# Altium PCB PCB1.PcbDoc (part 1 of 5)
Units mm, origin at the board's own origin, x right, y up, seen from the top; angles counter-clockwise.
Board outline 50 x 70 mm, 6 copper layers (Top Layer, L2, L3, L4, L5, Bottom Layer), stack 1.232 mm thick; 119 components, 75 nets, 612 pads, 243 vias.
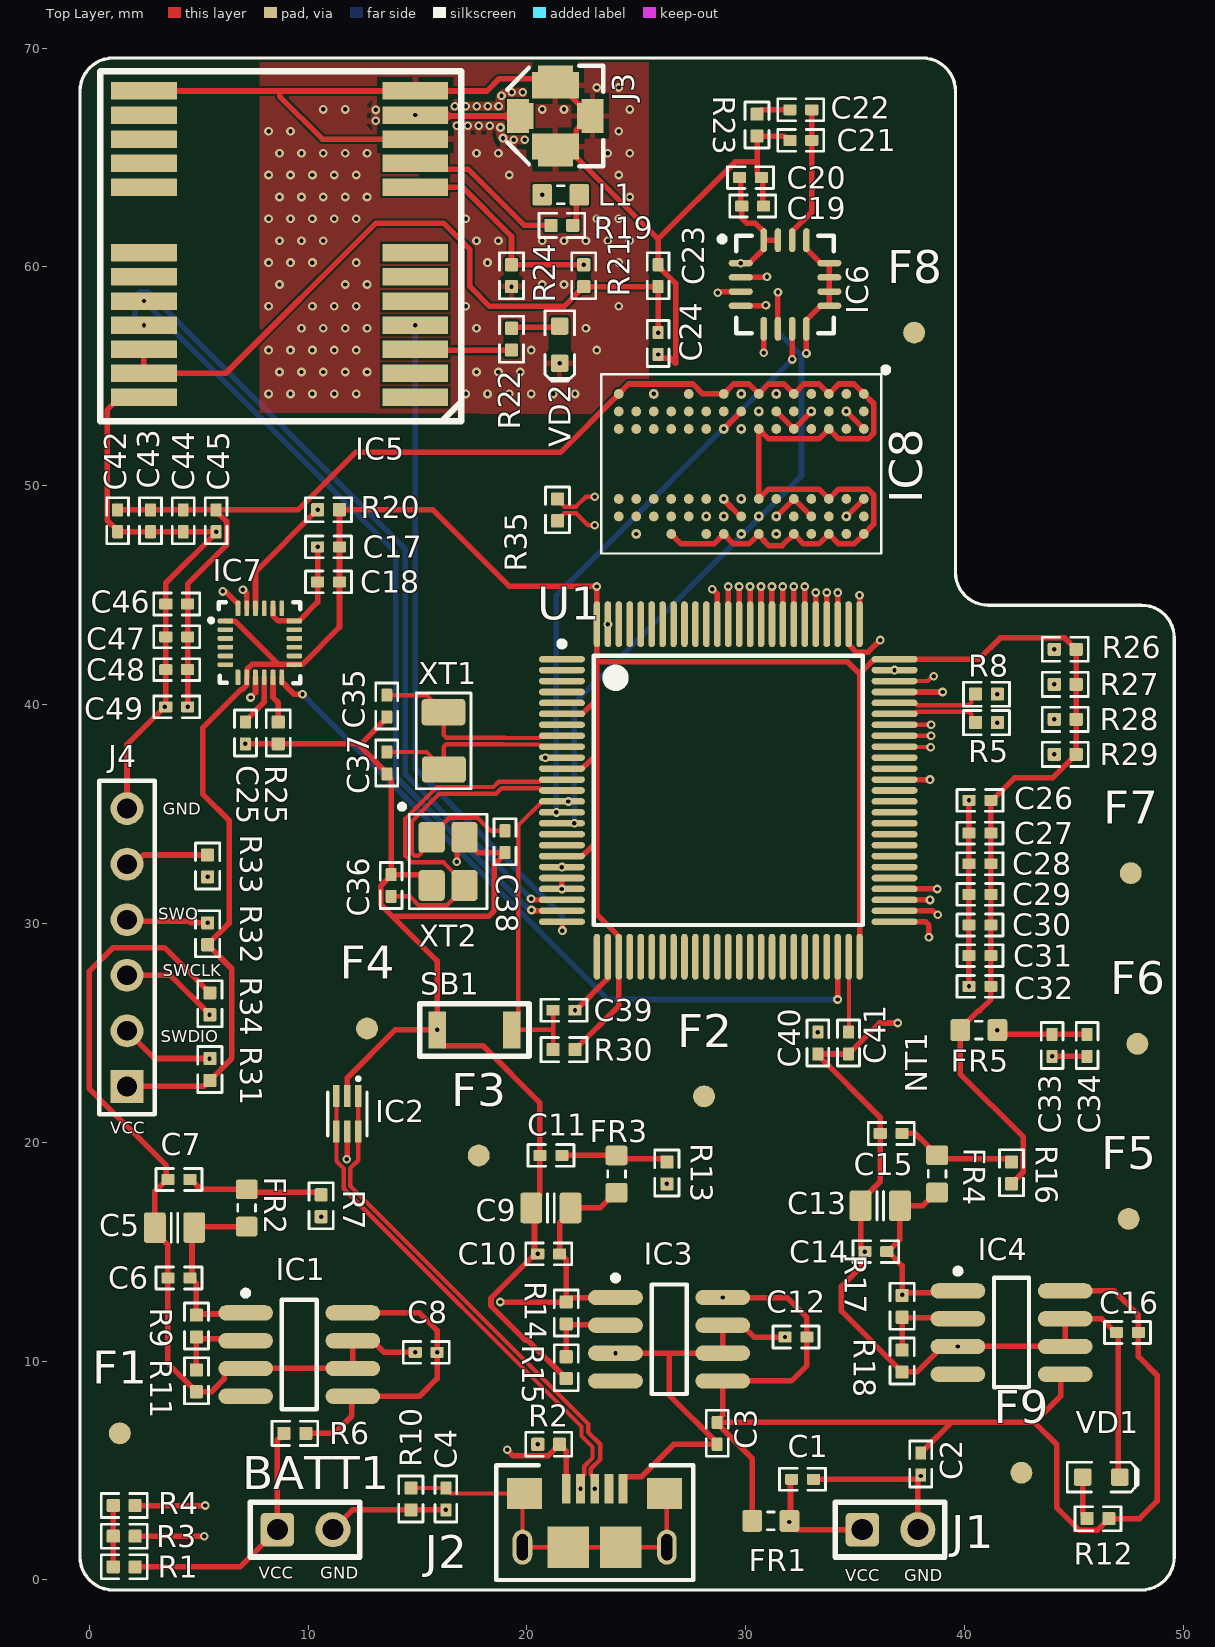
[diagram p0: Top Layer view]
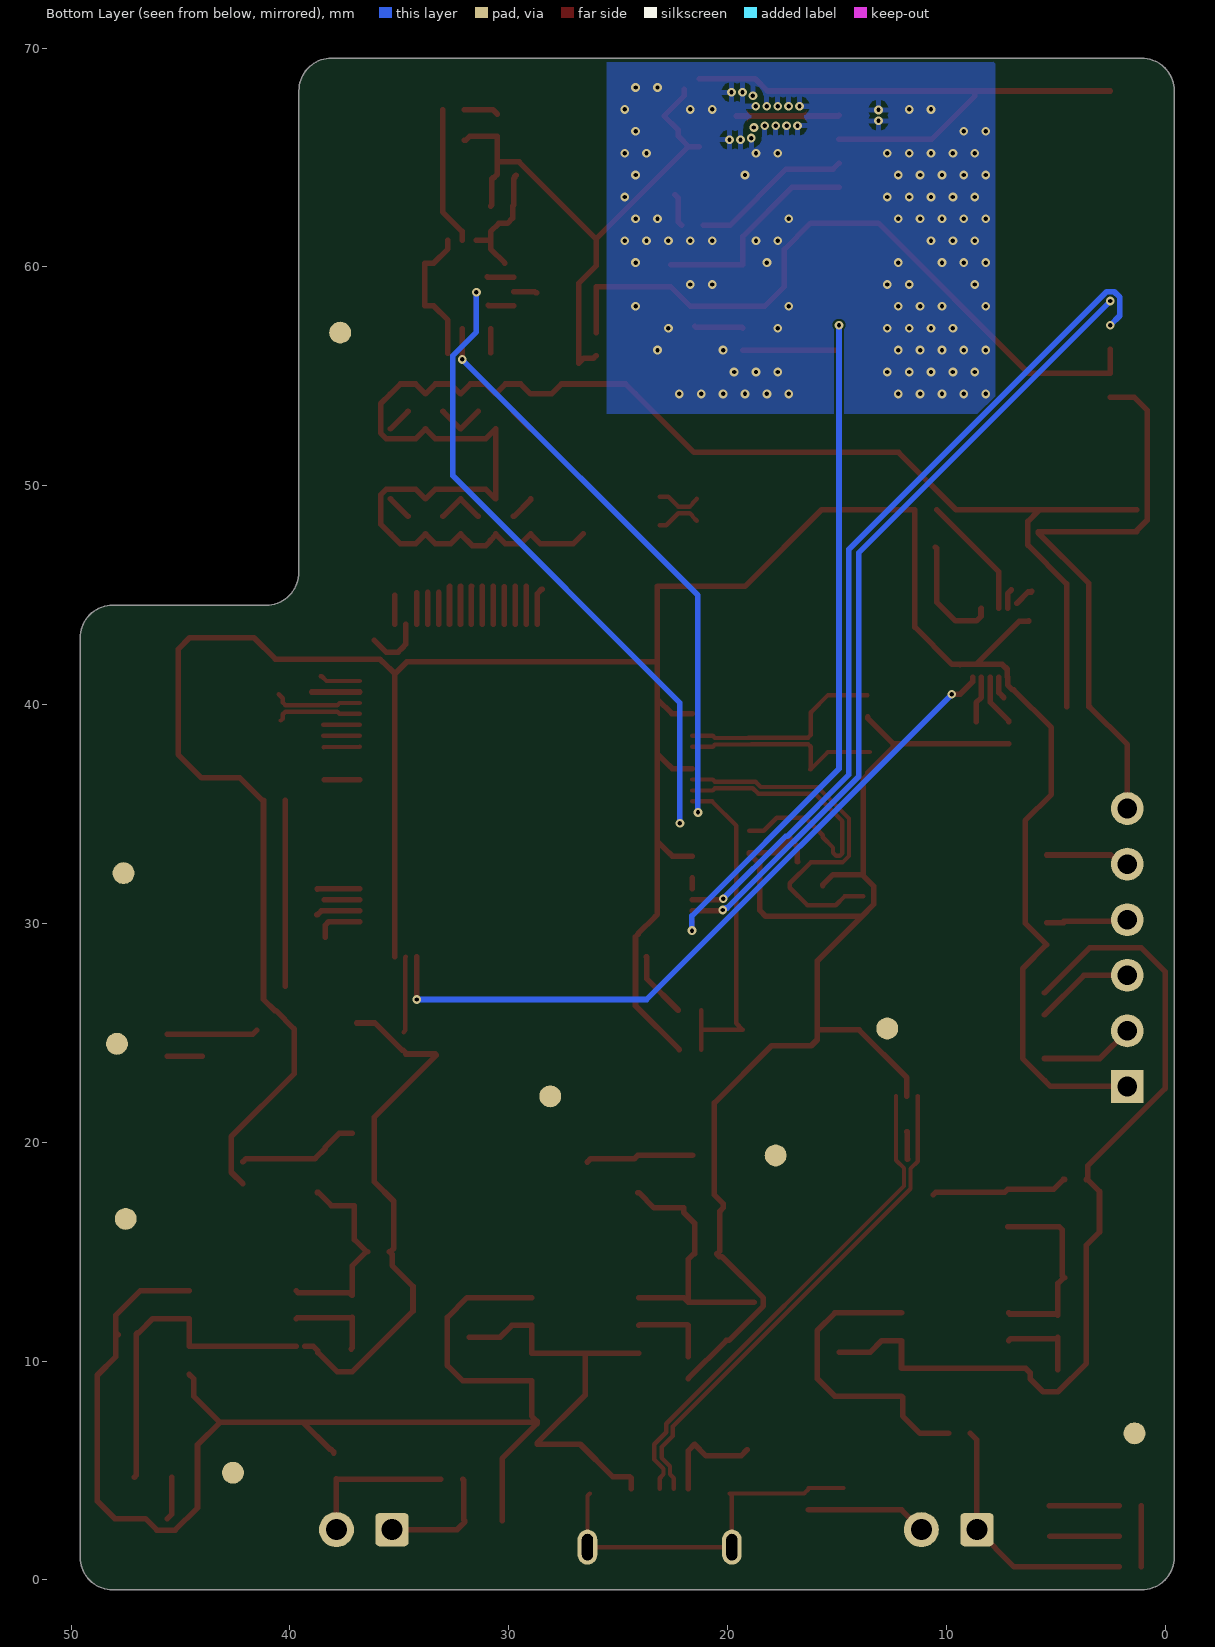
[diagram p1: Bottom Layer view, seen from below]
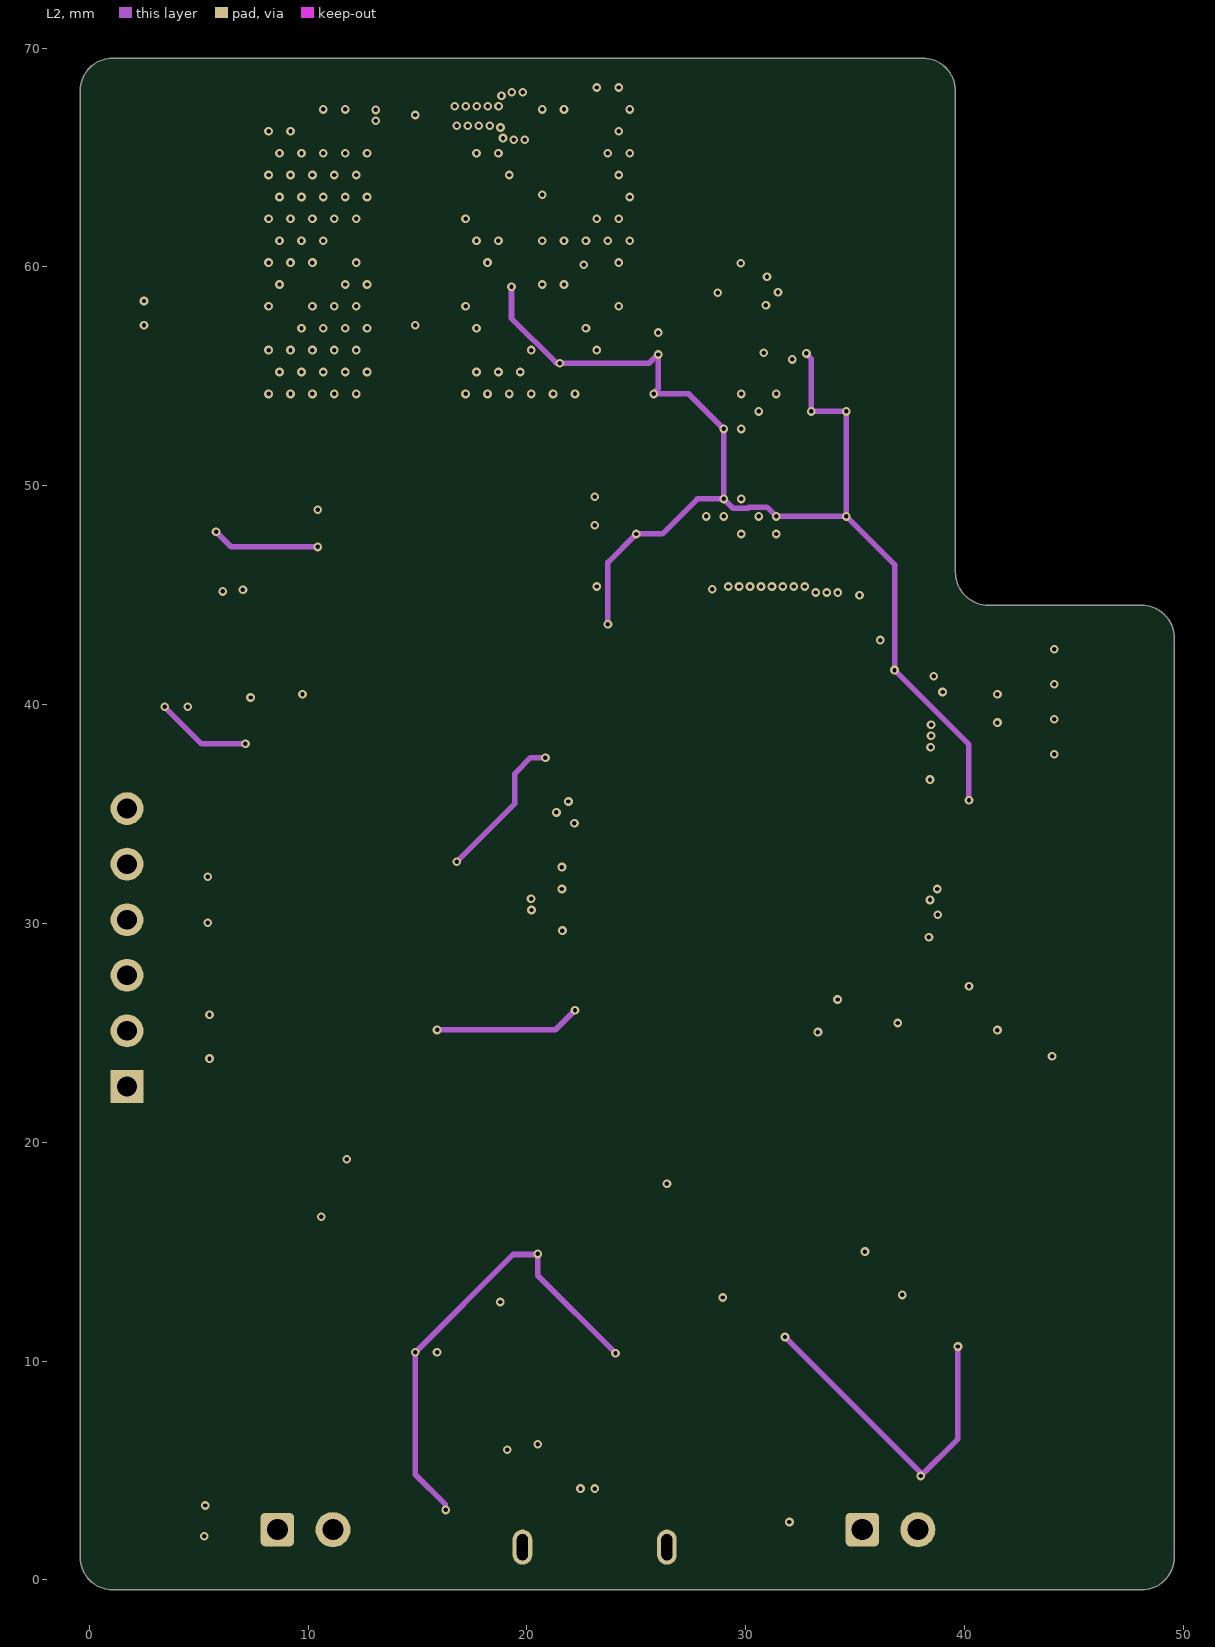
[diagram p2: L2]
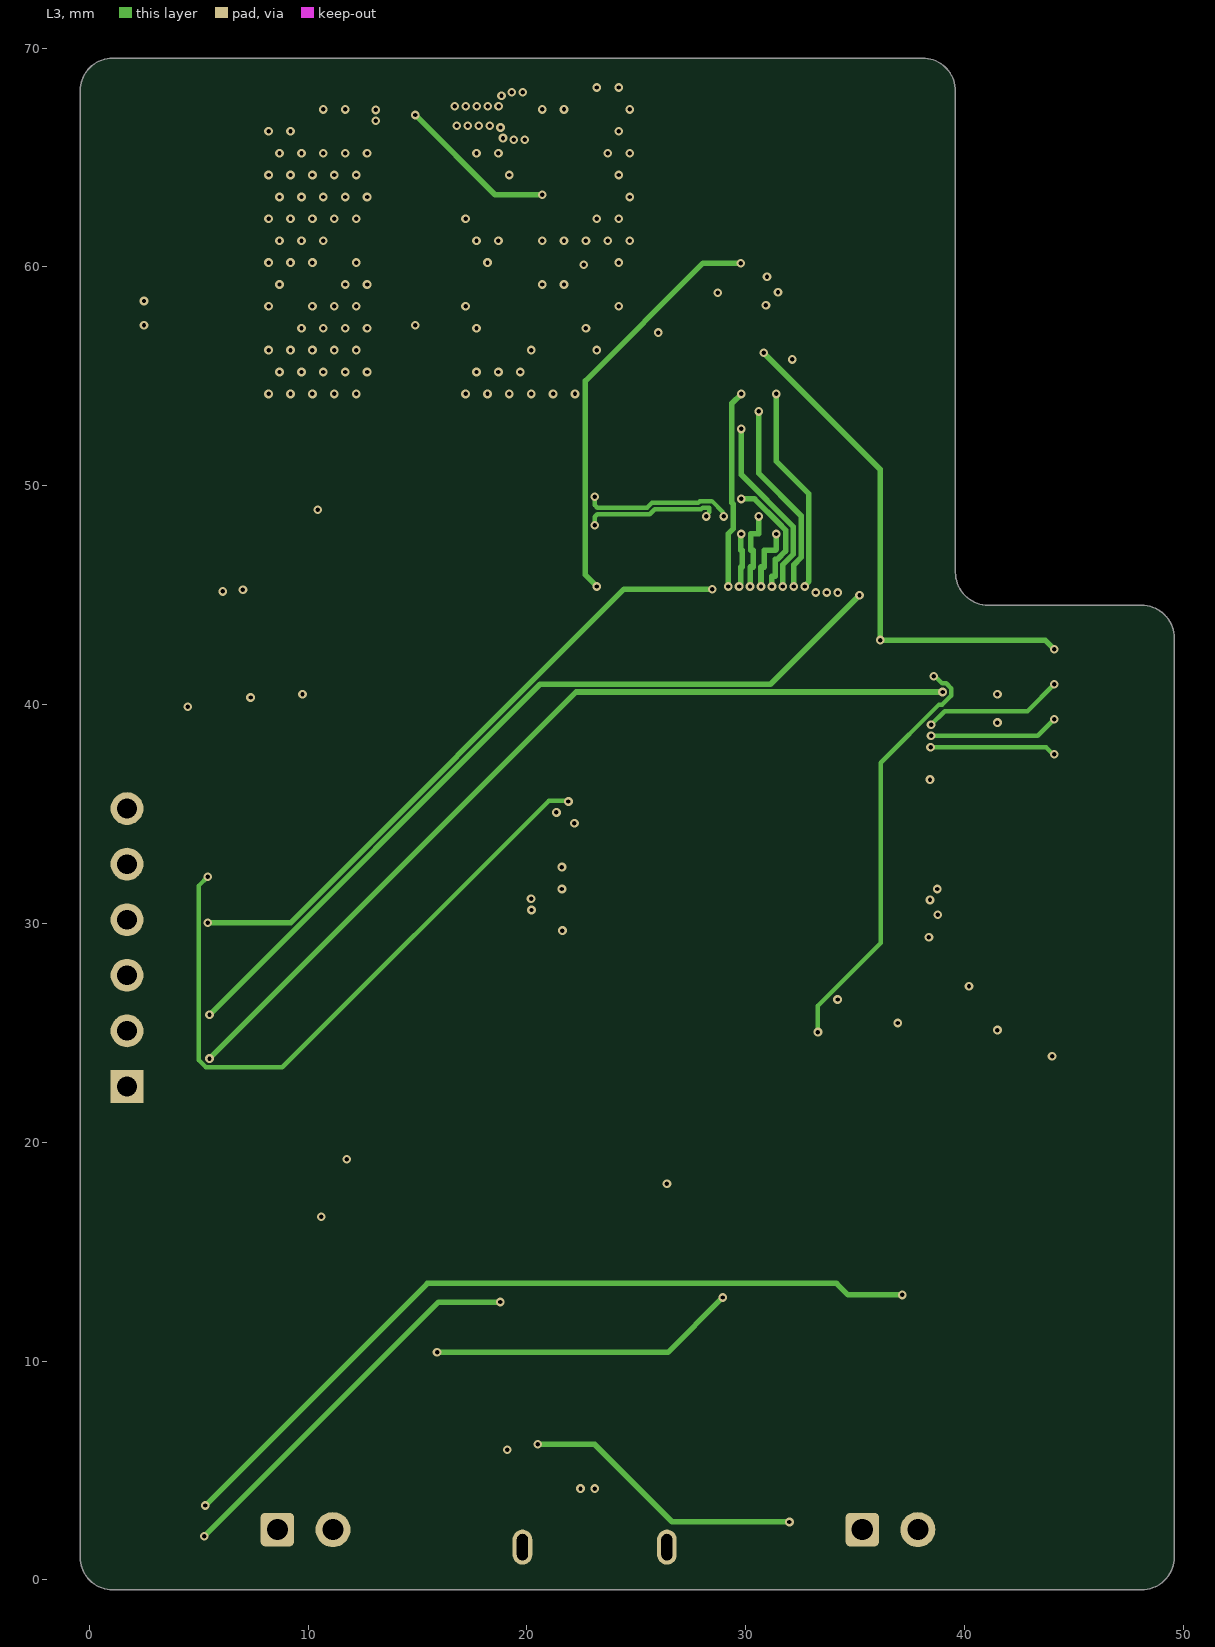
[diagram p3: L3]
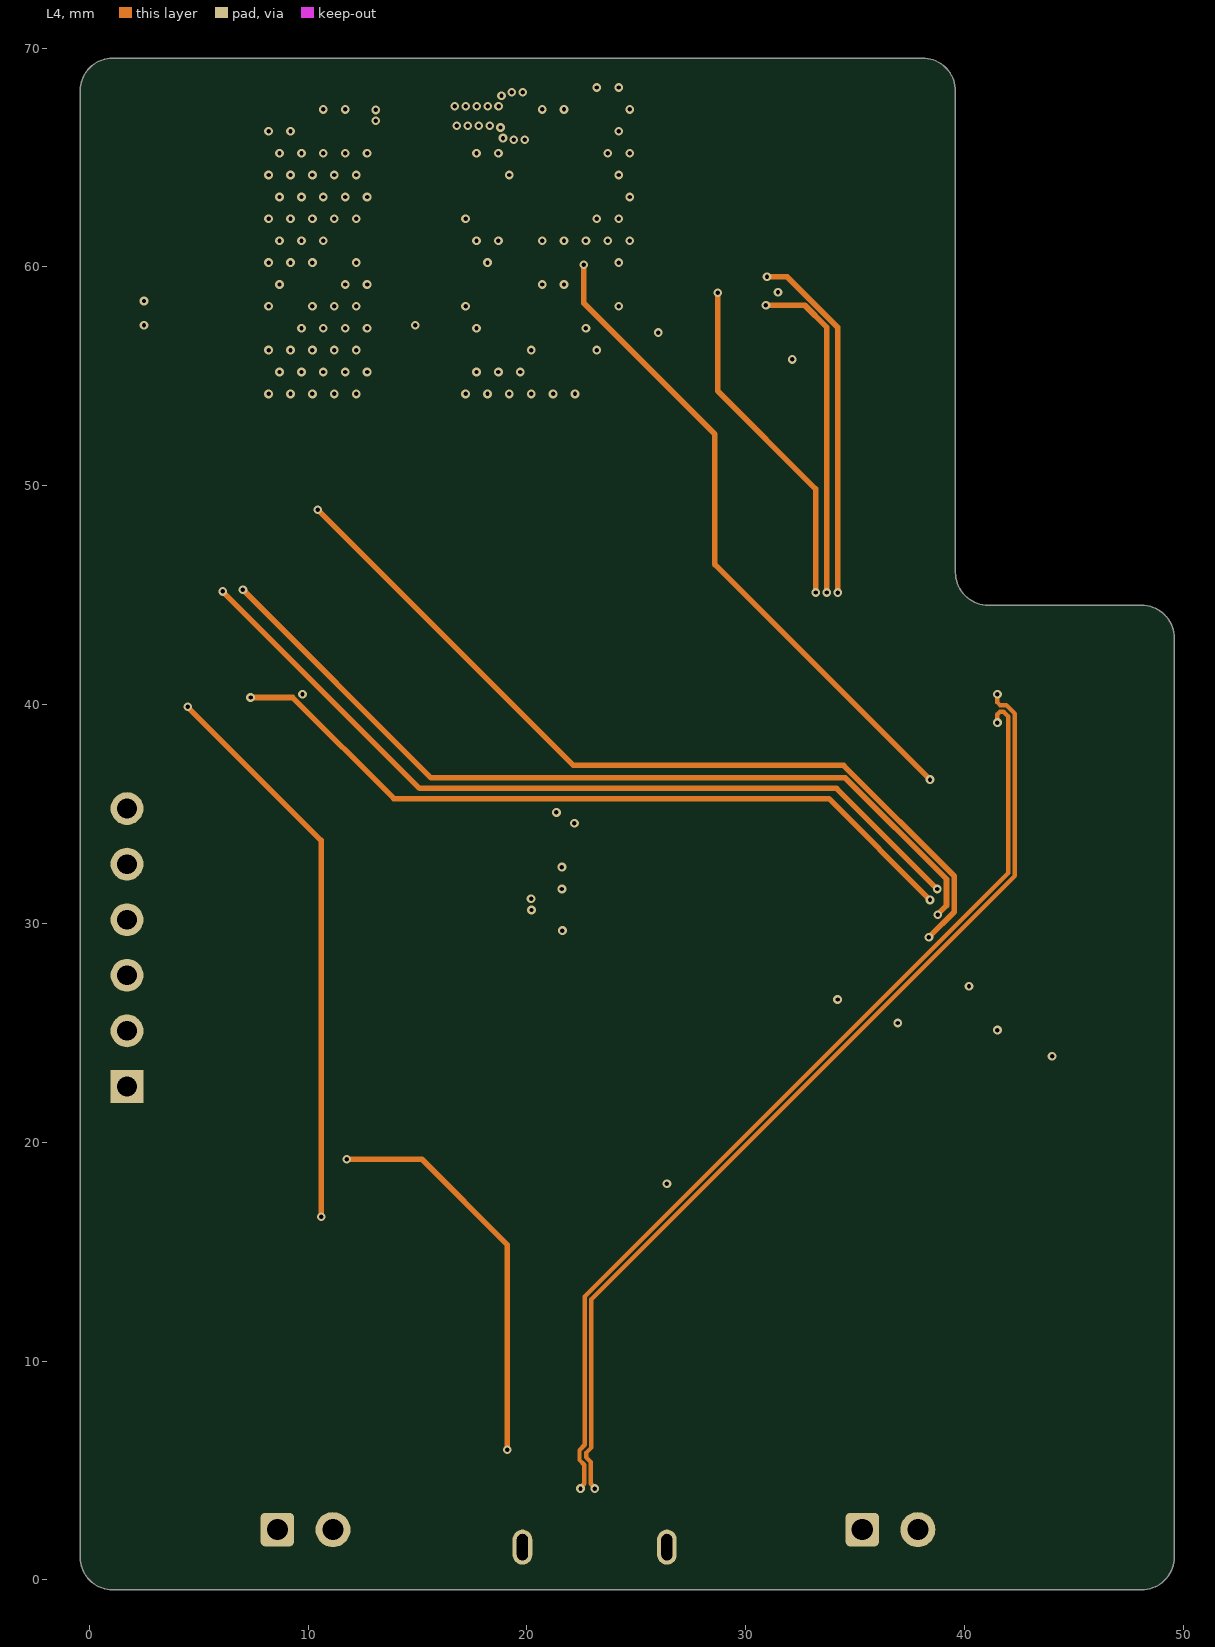
[diagram p4: L4]
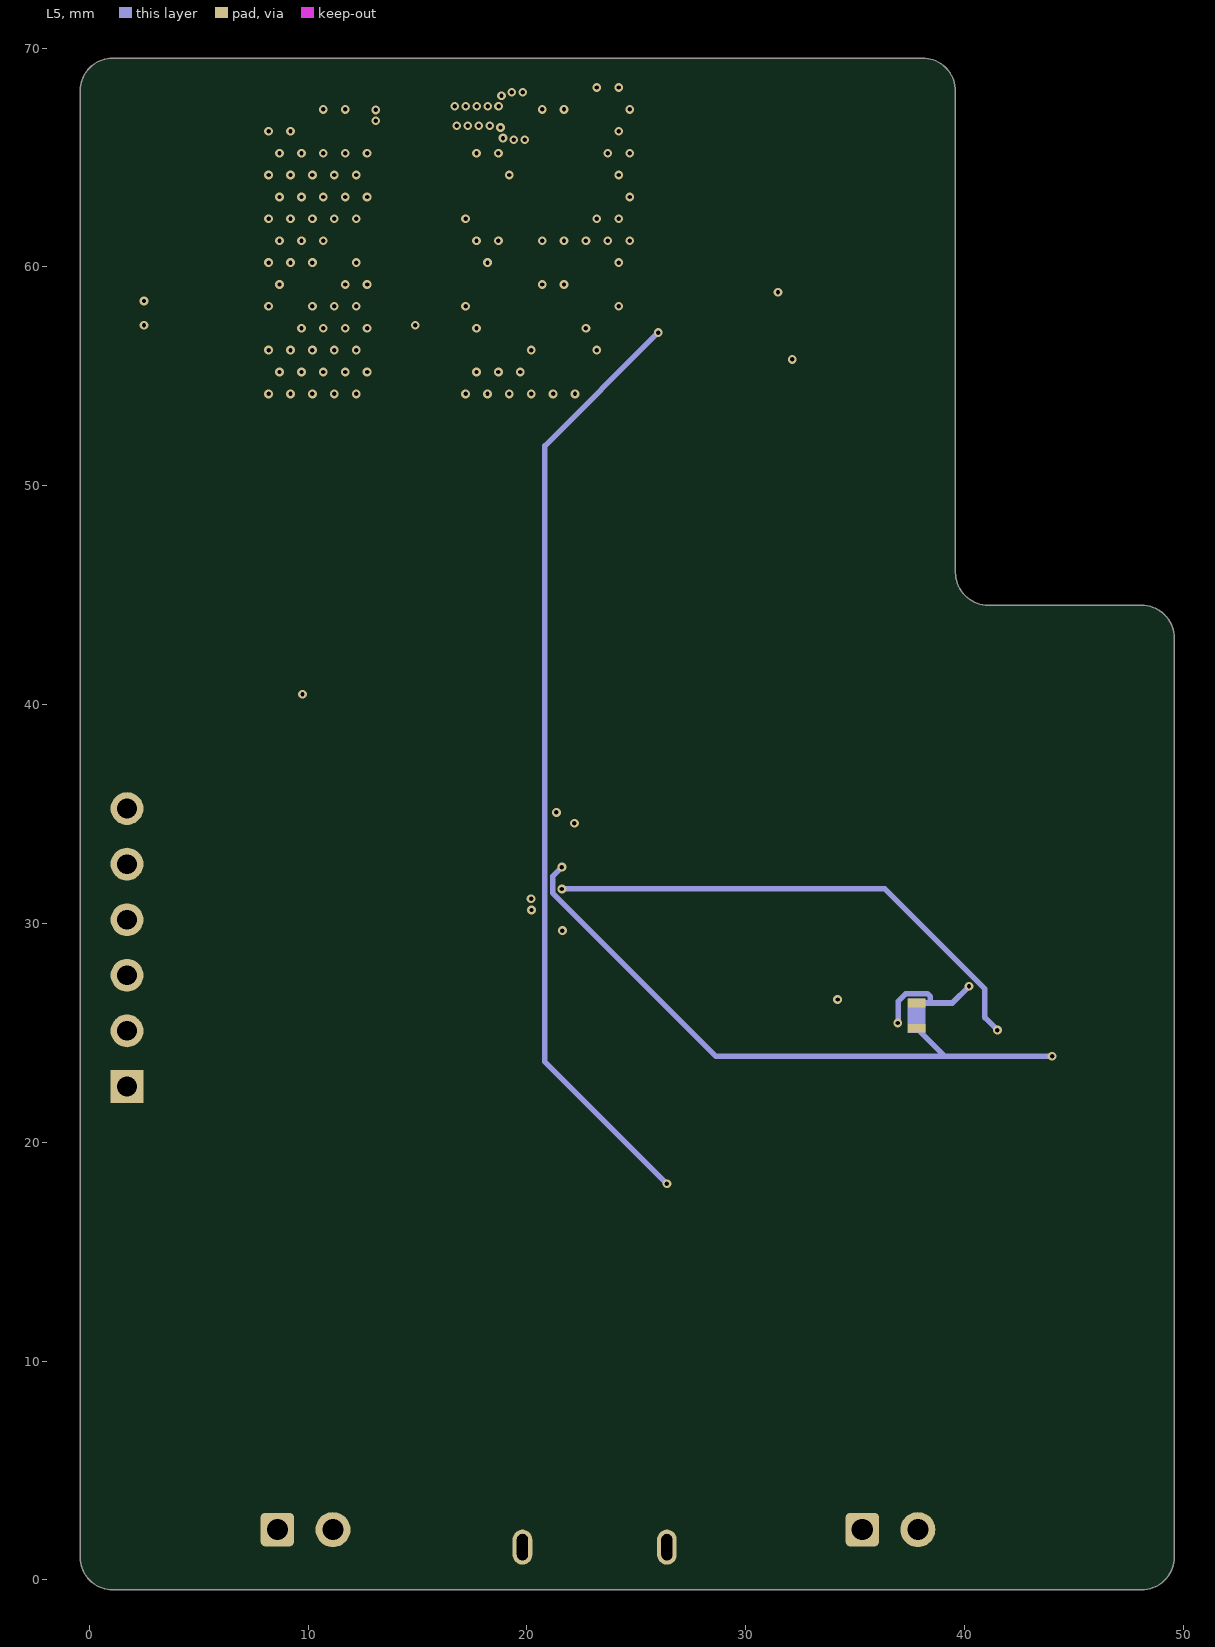
[diagram p5: L5]

## Layer stack, top to bottom
Top Solder: solder mask 0.01, Solder Resist, Dk 3.5
Top Layer: signal copper 0.036
Dielectric 1: core 0.254, FR-4, Dk 4.2
L2: signal copper 0.036
Dielectric 3: prepreg 0.127, PP-006, Dk 4.2
L3: signal copper 0.036
Dielectric 4: core 0.254, FR-4, Dk 4.2
L4: signal copper 0.036
Dielectric 6: prepreg 0.127, PP-006, Dk 4.2
L5: signal copper 0.036
Dielectric 5: core 0.254, FR-4, Dk 4.2
Bottom Layer: signal copper 0.036
Bottom Solder: solder mask 0.01, Solder Resist, Dk 3.5

## Board outline
-0.415,1.045 -0.415,68.045 cw(c1.085,68.045) 1.085,69.545 38.085,69.545 cw(c38.085,68.045) 39.585,68.045 39.585,46.045 ccw(c41.085,46.045) 41.085,44.545 48.085,44.545 cw(c48.085,43.045) 49.585,43.045 49.585,1.045 cw(c48.085,1.045) 48.085,-0.455 1.085,-0.455 cw(c1.085,1.045)

## Design rules (kind name [scope] priority, off if disabled: settings)
Clearance "Stitching No Net" [IsStitchingVia and InNet('No Net') vs (IsVia and (Not IsStitchingVia)) Or IsPad] p1: gap=0.127 ignorepadtopadclearanceinfootprint=FALSE
Clearance [All] p2: gap=0.1 ignorepadtopadclearanceinfootprint=FALSE
DiffPairsRouting DiffPairsRouting_1 [InDifferentialPair('CPU_LSOSC')] p1: maxlimit=0.262 minlimit=0.1 mostfreqgap=0.1 toplayer_minwidth=0.2 toplayer_maxwidth=0.2 toplayer_prefwidth=0.2 midlayer1_minwidth=0.2 midlayer1_maxwidth=0.2 midlayer1_prefwidth=0.2 midlayer2_minwidth=0.2 midlayer2_maxwidth=0.2 midlayer2_prefwidth=0.2 midlayer3_minwidth=0.2 midlayer3_maxwidth=0.2 midlayer3_prefwidth=0.2 midlayer4_minwidth=0.2 midlayer4_maxwidth=0.2 midlayer4_prefwidth=0.2 bottomlayer_minwidth=0.2 bottomlayer_maxwidth=0.2 bottomlayer_prefwidth=0.2 maxuncoupledlength=12.7
DiffPairsRouting DiffPairsRouting_7 [InDifferentialPair('DDR2_1_CLK')] p2: maxlimit=0.262 minlimit=0.1 mostfreqgap=0.1 toplayer_minwidth=0.2 toplayer_maxwidth=0.2 toplayer_prefwidth=0.2 midlayer1_minwidth=0.2 midlayer1_maxwidth=0.2 midlayer1_prefwidth=0.2 midlayer2_minwidth=0.2 midlayer2_maxwidth=0.2 midlayer2_prefwidth=0.2 midlayer3_minwidth=0.2 midlayer3_maxwidth=0.2 midlayer3_prefwidth=0.2 midlayer4_minwidth=0.2 midlayer4_maxwidth=0.2 midlayer4_prefwidth=0.2 bottomlayer_minwidth=0.2 bottomlayer_maxwidth=0.2 bottomlayer_prefwidth=0.2 maxuncoupledlength=12.7
DiffPairsRouting DiffPairsRouting_6 [InDifferentialPair('USB2_D1')] p3: maxlimit=0.6 minlimit=0.1 mostfreqgap=0.1 toplayer_minwidth=0.2 toplayer_maxwidth=0.2 toplayer_prefwidth=0.2 midlayer1_minwidth=0.2 midlayer1_maxwidth=0.2 midlayer1_prefwidth=0.2 midlayer2_minwidth=0.2 midlayer2_maxwidth=0.2 midlayer2_prefwidth=0.2 midlayer3_minwidth=0.2 midlayer3_maxwidth=0.2 midlayer3_prefwidth=0.2 midlayer4_minwidth=0.2 midlayer4_maxwidth=0.2 midlayer4_prefwidth=0.2 bottomlayer_minwidth=0.2 bottomlayer_maxwidth=0.2 bottomlayer_prefwidth=0.2 maxuncoupledlength=12.7
DiffPairsRouting DiffPairsRouting_5 [InDifferentialPair('USB2_D2')] p4: maxlimit=0.262 minlimit=0.1 mostfreqgap=0.1 toplayer_minwidth=0.2 toplayer_maxwidth=0.2 toplayer_prefwidth=0.2 midlayer1_minwidth=0.2 midlayer1_maxwidth=0.2 midlayer1_prefwidth=0.2 midlayer2_minwidth=0.2 midlayer2_maxwidth=0.2 midlayer2_prefwidth=0.2 midlayer3_minwidth=0.2 midlayer3_maxwidth=0.2 midlayer3_prefwidth=0.2 midlayer4_minwidth=0.2 midlayer4_maxwidth=0.2 midlayer4_prefwidth=0.2 bottomlayer_minwidth=0.2 bottomlayer_maxwidth=0.2 bottomlayer_prefwidth=0.2 maxuncoupledlength=12.7
DiffPairsRouting DiffPairsRouting_4 [InDifferentialPair('DDR2_1_CLK')] p5: maxlimit=0.262 minlimit=0.1 mostfreqgap=0.1 toplayer_minwidth=0.2 toplayer_maxwidth=0.2 toplayer_prefwidth=0.2 midlayer1_minwidth=0.2 midlayer1_maxwidth=0.2 midlayer1_prefwidth=0.2 midlayer2_minwidth=0.2 midlayer2_maxwidth=0.2 midlayer2_prefwidth=0.2 midlayer3_minwidth=0.2 midlayer3_maxwidth=0.2 midlayer3_prefwidth=0.2 midlayer4_minwidth=0.2 midlayer4_maxwidth=0.2 midlayer4_prefwidth=0.2 bottomlayer_minwidth=0.2 bottomlayer_maxwidth=0.2 bottomlayer_prefwidth=0.2 maxuncoupledlength=12.7
DiffPairsRouting DiffPairsRouting_3 [InDifferentialPair('CPU_HSOSC')] p6: maxlimit=0.262 minlimit=0.1 mostfreqgap=0.1 toplayer_minwidth=0.2 toplayer_maxwidth=0.2 toplayer_prefwidth=0.2 midlayer1_minwidth=0.2 midlayer1_maxwidth=0.2 midlayer1_prefwidth=0.2 midlayer2_minwidth=0.2 midlayer2_maxwidth=0.2 midlayer2_prefwidth=0.2 midlayer3_minwidth=0.2 midlayer3_maxwidth=0.2 midlayer3_prefwidth=0.2 midlayer4_minwidth=0.2 midlayer4_maxwidth=0.2 midlayer4_prefwidth=0.2 bottomlayer_minwidth=0.2 bottomlayer_maxwidth=0.2 bottomlayer_prefwidth=0.2 maxuncoupledlength=12.7
DiffPairsRouting DiffPairsRouting_2 [InDifferentialPair('USB2_D2')] p7: maxlimit=0.262 minlimit=0.1 mostfreqgap=0.1 toplayer_minwidth=0.2 toplayer_maxwidth=0.2 toplayer_prefwidth=0.2 midlayer1_minwidth=0.2 midlayer1_maxwidth=0.2 midlayer1_prefwidth=0.2 midlayer2_minwidth=0.2 midlayer2_maxwidth=0.2 midlayer2_prefwidth=0.2 midlayer3_minwidth=0.2 midlayer3_maxwidth=0.2 midlayer3_prefwidth=0.2 midlayer4_minwidth=0.2 midlayer4_maxwidth=0.2 midlayer4_prefwidth=0.2 bottomlayer_minwidth=0.2 bottomlayer_maxwidth=0.2 bottomlayer_prefwidth=0.2 maxuncoupledlength=12.7
DiffPairsRouting [All] p8: maxlimit=0.254 minlimit=0.254 mostfreqgap=0.254 toplayer_minwidth=0.381 toplayer_maxwidth=0.381 toplayer_prefwidth=0.381 midlayer1_minwidth=0.381 midlayer1_maxwidth=0.381 midlayer1_prefwidth=0.381 midlayer2_minwidth=0.381 midlayer2_maxwidth=0.381 midlayer2_prefwidth=0.381 midlayer3_minwidth=0.381 midlayer3_maxwidth=0.381 midlayer3_prefwidth=0.381 midlayer4_minwidth=0.381 midlayer4_maxwidth=0.381 midlayer4_prefwidth=0.381 bottomlayer_minwidth=0.381 bottomlayer_maxwidth=0.381 bottomlayer_prefwidth=0.381 maxuncoupledlength=12.7
HoleToHoleClearance [All] p1: gap=0.2 allowstackedmicrovias=TRUE
MatchedLengths [InNetClass('DDR2_2_DQ[0..7]')] p1: tolerance=7 checknetsindiffpair=FALSE checkdiffpairvsdiffpair=TRUE checkxsignals=TRUE checkothers=TRUE
MinimumSolderMaskSliver [All] p1: minsoldermaskwidth=0.1
PolygonConnect [All] p1: connectstyle=Relief reliefconductorwidth=0.254 reliefentries=4 polygonreliefangle="90 Angle" airgapwidth=0.254
RoutingVias [All] p1: holewidth=0.2 width=0.4 viastyle="Through Hole" minholewidth=0.2 minwidth=0.4 maxholewidth=0.711 maxwidth=1.27
SolderMaskExpansion [All] p1: expansion=0.1 istentingtop=FALSE
SupplyNets "Schematic Supply Nets_7" [InNet('VCC3P7_BATT')] p1: voltage=0.000
SupplyNets "Schematic Supply Nets_6" [InNet('VCC5P0_USB')] p2: voltage=0.000
SupplyNets "Schematic Supply Nets_5" [InNet('AVDD')] p3: voltage=0.000
SupplyNets "Schematic Supply Nets_4" [InNet('GND')] p4: voltage=0.000
SupplyNets "Schematic Supply Nets_3" [InNet('VCC3P3_MCU')] p5: voltage=0.000
SupplyNets "Schematic Supply Nets_2" [InNet('VCC3P3_RF')] p6: voltage=0.000
SupplyNets "Schematic Supply Nets_1" [InNet('GNDA')] p7: voltage=0.000
SupplyNets "Schematic Supply Nets" [InNet('VCC1P8_DDR2')] p8: voltage=0.000
Width [All] p1: maxlimit=0.254 minlimit=0.1 preferedwidth=0.254
27 further rules are at their usual default settings.

## Classes and differential pairs
net class DDR2_2_DQ[0..7]: DDR2_2_DQ0 DDR2_2_DQ1 DDR2_2_DQ2 DDR2_2_DQ3 DDR2_2_DQ4 DDR2_2_DQ5 DDR2_2_DQ6 DDR2_2_DQ7
component class 02_MCU_DDR: C26 C27 C28 C29 C30 C31 C32 C33 C34 C35 C36 C37 C38 C39 C40 C41 C42 C43 C44 C45 C46 C47 C48 C49 F9 FR5 IC8 J4 NT1 R26 R27 R28 R29 R30 R31 R32 R33 R34 R35 SB1 XT1 XT2
component class 01_Power_RF: ANT1 BATT1 C1 C2 C3 C4 C5 C6 C7 C8 C9 C10 C11 C12 C13 C14 C15 C16 C17 C18 C19 C20 C21 C22 C23 C24 C25 F1 F2 F3 F4 F5 F6 F7 F8 FR1 FR2 FR3 FR4 IC1 IC2 IC3 IC4 IC6 IC7 J1 J2 J3 L1 R1 R2 R3 R4 R5 R6 R7 R8 R9 R10 R11 R12 R13 R14 R15 R16 R17 R18 R19 R20 R21 R22 R23 R24 R25 VD1 VD2
differential pair USB2_D2: +USB2_D2_P -USB2_D2_N
differential pair USB2_D1: +USB2_D1_P -USB2_D1_N
differential pair DDR2_1_CLK: +DDR2_1_CLK_P -DDR2_1_CLK_N
differential pair CPU_LSOSC: +CPU_LSOSC_P -CPU_LSOSC_N
differential pair CPU_HSOSC: +CPU_HSOSC_P -CPU_HSOSC_N

## Components (designator, comment, footprint, x,y, rotation, side; value= is the part's Value field where it differs from the comment)
BATT1 "3.7V, 600mAh" HDR_1x2 9.87,2.3 r90 top
C1 "100nF, 16V" CAP0402 32.6,4.6 r180 top
C2 "10uF, 6.3V" CAP0402 38,5.3 r90 top
C3 "4.7uF, 6.3V" CAP0402 28.7,6.7 r90 top
C4 "3.9nF, 16V" CAP0402 16.3,3.7 r90 top
C5 "47uF, 6.3V" CAP0805 3.9,16.1 r0 top
C6 "10uF, 6.3V" CAP0402 4.1,13.8 r0 top
C7 "100nF, 16V" CAP0402 4.1,18.3 r180 top
C8 "10uF, 6.3V" CAP0402 15.4,10.4 r0 top
C9 "47uF, 6.3V" CAP0805 21.1,17 r0 top
C10 "10uF, 6.3V" CAP0402 21,14.9 r0 top
C11 "100nF, 16V" CAP0402 21.1,19.4 r0 top
C12 "10uF, 6.3V" CAP0402 32.3,11.1 r0 top
C13 "47uF, 6.3V" CAP0805 36.15,17.105 r0 top
C14 "10uF, 6.3V" CAP0402 35.95,15.005 r0 top
C15 "100nF, 16V" CAP0402 36.65,20.405 r0 top
C16 "10uF, 6.3V" CAP0402 47.45,11.305 r0 top
C17 "100nF, 16V" CAP0402 10.94,47.208 r0 top
C18 "100nF, 16V" CAP0402 10.94,45.608 r0 top
C19 "4.7uF, 6.3V" CAP0402 30.321,62.783 r180 top
C20 "100nF, 16V" CAP0402 30.221,64.083 r180 top
C21 "10nF, 50V" CAP0402 32.521,65.783 r0 top
C22 "470nF, 10V" CAP0402 32.521,67.183 r0 top
C23 "100nF, 16V" CAP0402 26,59.6 r270 top
C24 "10uF, 6.3V" CAP0402 26,56.5 r90 top
C25 "100nF, 16V" CAP0402 7.14,38.708 r90 top
C26 "100nF, 16V" CAP0402 40.704,35.628 r0 top
C27 "100nF, 16V" CAP0402 40.704,34.128 r0 top
C28 "100nF, 16V" CAP0402 40.704,32.728 r0 top
C29 "100nF, 16V" CAP0402 40.704,31.328 r0 top
C30 "100nF, 16V" CAP0402 40.704,29.928 r0 top
C31 "100nF, 16V" CAP0402 40.704,28.528 r0 top
C32 "100nF, 16V" CAP0402 40.704,27.128 r0 top
C33 "10uF, 6.3V" CAP0402 44.004,24.428 r90 top
C34 "100nF, 16V" CAP0402 45.604,24.428 r90 top
C35 "4pF, 50V" CAP0402 13.6,39.935 r90 top
C36 "33pF, 50V" CAP0402 13.8,31.735 r90 top
C37 "4pF, 50V" CAP0402 13.6,37.335 r90 top
C38 "33pF, 50V" CAP0402 19,33.735 r270 top
C39 "100nF, 16V" CAP0402 21.7,26.035 r180 top
C40 "2.2uF, 4V" CAP0402 33.3,24.535 r90 top
C41 "2.2uF, 4V" CAP0402 34.7,24.535 r90 top
C42 "100nF, 16V" CAP0402 1.3,48.4 r90 top
C43 "100nF, 16V" CAP0402 2.8,48.4 r90 top
C44 "100nF, 16V" CAP0402 4.3,48.4 r90 top
C45 "100nF, 16V" CAP0402 5.8,48.4 r90 top
C46 "10uF, 6.3V" CAP0402 4,44.6 r0 top
C47 "4.7uF, 6.3V" CAP0402 4,43.1 r0 top
C48 "2.2uF, 4V" CAP0402 4,41.6 r0 top
C49 "100nF, 16V" CAP0402 4,39.9 r0 top
F1 "Fiducial" Fiducial 1.4,6.7 r0 top
F2 "Fiducial" Fiducial 28.1,22.1 r0 top
F3 "Fiducial" Fiducial 17.8,19.4 r0 top
F4 "Fiducial" Fiducial 12.7,25.2 r0 top
F5 "Fiducial" Fiducial 47.5,16.5 r0 top
F6 "Fiducial" Fiducial 47.9,24.5 r0 top
F7 "Fiducial" Fiducial 47.6,32.3 r0 top
F8 "Fiducial" Fiducial 37.7,57 r0 top
F9 "Fiducial" Fiducial 42.6,4.9 r0 top
FR1 "Ferrite 600R@100Mhz" RES0603 31.15,2.7 r180 top value=380mΩ
FR2 "Ferrite 600R@100Mhz" RES0603 7.2,17 r90 top value=380mΩ
FR3 "Ferrite 600R@100Mhz" RES0603 24.1,18.55 r90 top value=380mΩ
FR4 "Ferrite 600R@100Mhz" RES0603 38.75,18.555 r90 top value=380mΩ
FR5 "Ferrite 600R@100Mhz" RES0603 40.654,25.128 r180 top value=380mΩ
IC1 "LT1763" LT-S8-8_M 9.6,10.3 r0 top
IC2 "USB_ESD" USBULC6 11.8,21.3 r270 top
IC3 "LT1763" LT-S8-8_M 26.5,11 r0 top
IC4 "LT1763" LT-S8-8_M 42.15,11.305 r0 top
IC5 "NEO-7M" NEO-M8M 8.704,61.042 r0 top
IC6 "L3G4200D" LGA16-4X4X1.1_N 31.8,59.2 r0 top
IC7 "MPU-9255" MPU-9255 7.8,42.825 r0 top
IC8 "AS4C64M16D2-25BCN" AS4C64M16D2 29.8,51 r270 top
J1 "Header 2x1 pin" HDR_1x2 36.6,2.3 r90 top
J2 "USB Micro Type B" microUSB 23.1,1.5 r0 top
J3 "ANT" MMCX_UFL_conn_u 21.3,66.9 r90 top
J4 "Programmer" HDR1X6 1.729,22.551 r90 top
L1 "27nH, 600mA" RES0603 21.55,63.3 r180 top
NT1 "NetTie" NetTie_Narrow2 37.813,25.789 r90 top net-tie
R1 "0R" RES0402 1.6,0.6 r180 top
R2 "0R" RES0402 21,6.2 r180 top
R3 "0R" RES0402 1.6,2 r180 top
R4 "0R" RES0402 1.6,3.4 r180 top
R5 "22R, 5%" RES0402 41.004,39.178 r180 top
R6 "0R" RES0402 9.4,6.7 r0 top
R7 "0R" RES0402 10.6,17.1 r270 top
R8 "22R, 5%" RES0402 41.004,40.478 r180 top
R9 "4.75k, 1%" RES0402 4.9,11.6 r90 top
R10 "1M, 1%" RES0402 14.7,3.7 r90 top
R11 "10k. 1%" RES0402 4.9,9.1 r90 top
R12 "1k, 1%" RES0402 46.1,2.8 r0 top
R13 "0R" RES0402 26.4,18.6 r270 top
R14 "10k. 1%" RES0402 21.8,12.2 r90 top
R15 "5.9k, 1%" RES0402 21.8,9.7 r90 top
R16 "0R" RES0402 42.15,18.605 r270 top
R17 "10k. 1%" RES0402 37.15,12.505 r90 top
R18 "5.9k, 1%" RES0402 37.15,10.005 r90 top
R19 "10R, 1%" RES0402 21.6,61.9 r0 top
R20 "10k. 1%" RES0402 10.94,48.908 r0 top
R21 "10k. 1%" RES0402 22.6,59.6 r270 top
R22 "1k, 1%" RES0402 19.3,56.7 r270 top
R23 "10k. 1%" RES0402 30.521,66.483 r270 top
R24 "0R" RES0402 19.3,59.6 r90 top
R25 "0R" RES0402 8.64,38.708 r90 top
R26 "10k. 1%" RES0402 44.604,42.528 r0 top
R27 "10k. 1%" RES0402 44.604,40.928 r0 top
R28 "10k. 1%" RES0402 44.604,39.328 r0 top
R29 "10k. 1%" RES0402 44.604,37.728 r0 top
R30 "10k. 1%" RES0402 21.7,24.235 r0 top
R31 "10k. 1%" RES0402 5.515,23.329 r270 top
R32 "10k. 1%" RES0402 5.415,29.529 r270 top
R33 "0R" RES0402 5.415,32.629 r90 top
R34 "10k. 1%" RES0402 5.515,26.329 r270 top
R35 "100R, 1%" RES0402 21.4,48.9 r270 top
SB1 "Button" SW_tactile 17.6,25.135 r180 top
U1 "STM32F427VIT6" STM-LQFP100_M 29.204,36.077 r0 top
VD1 "LED_green" LED-0603-GREEN 46.25,4.7 r0 top
VD2 "LED_green" LED-0603-GREEN 21.5,56.45 r270 top
XT1 "32.768 MHz" CRYSTAL_v2 16.2,38.335 r90 top
XT2 "8MHz" CRYSTAL_4-LCC 16.4,32.835 r270 top

## Footprints (in the part's own frame and the unit in brackets; to place one, negate y for a bottom-side part, rotate by r counter-clockwise, add the part's x,y. Pads: shape width x height; smd on the part's side, far side on the other; paste and mask are expansions set on the pad)
AS4C64M16D2 [mm]
  round 0.45 smd: A1(-3.2,5.6) A2(-2.4,5.6) A3(-1.6,5.6) A7(1.6,5.6) A8(2.4,5.6) A9(3.2,5.6) B1(-3.2,4.8) B2(-2.4,4.8) B3(-1.6,4.8) B7(1.6,4.8) B8(2.4,4.8) B9(3.2,4.8) C1(-3.2,4) C2(-2.4,4) C3(-1.6,4) C7(1.6,4) C8(2.4,4) C9(3.2,4) D1(-3.2,3.2) D2(-2.4,3.2) D3(-1.6,3.2) D7(1.6,3.2) D8(2.4,3.2) D9(3.2,3.2) E1(-3.2,2.4) E2(-2.4,2.4) E3(-1.6,2.4) E7(1.6,2.4) E8(2.4,2.4) E9(3.2,2.4) F1(-3.2,1.6) F2(-2.4,1.6) F3(-1.6,1.6) F7(1.6,1.6) F8(2.4,1.6) F9(3.2,1.6) G1(-3.2,0.8) G2(-2.4,0.8) G3(-1.6,0.8) G7(1.6,0.8) G8(2.4,0.8) G9(3.2,0.8) H1(-3.2,0) H2(-2.4,0) H3(-1.6,0) H7(1.6,0) H8(2.4,0) H9(3.2,0) J1(-3.2,-0.8) J2(-2.4,-0.8) J3(-1.6,-0.8) J7(1.6,-0.8) J8(2.4,-0.8) J9(3.2,-0.8) K2(-2.4,-1.6) K3(-1.6,-1.6) K7(1.6,-1.6) K8(2.4,-1.6) K9(3.2,-1.6) L1(-3.2,-2.4) L2(-2.4,-2.4) L3(-1.6,-2.4) L7(1.6,-2.4) L8(2.4,-2.4) M2(-2.4,-3.2) M3(-1.6,-3.2) M7(1.6,-3.2) M8(2.4,-3.2) M9(3.2,-3.2) N1(-3.2,-4) N2(-2.4,-4) N3(-1.6,-4) N7(1.6,-4) N8(2.4,-4) P2(-2.4,-4.8) P3(-1.6,-4.8) P7(1.6,-4.8) P8(2.4,-4.8) P9(3.2,-4.8) R1(-3.2,-5.6) R2(-2.4,-5.6) R3(-1.6,-5.6) R7(1.6,-5.6) R8(2.4,-5.6)
  silkscreen extent -4.42,-6.4 4.1,6.73, body extent -4,-6.25 4,6.25, height 1.25
CAP0402 [mm] "Chip Capacitor, Body 1.0x0.5mm, 0402, IPC Medium Density"
  round 0.2 on Mech15: 0(0,0)
  rrect20% 0.6x0.5 smd: 1(-0.5,0) 2(0.5,0)
  Top Layer pour cut-out: -0.2,0.35 0.2,0.35 0.2,-0.35 -0.2,-0.35
  silkscreen extent -1.05,-0.5 1.05,0.5, body extent -0.52,-0.27 0.53,0.28, height 0.55
CAP0805 [mm] "Chip Capacitor, Body 2.0x1.2mm, 0805, IPC Medium Density"
  round 0.254 on Mech15: 0(0,0)
  rrect25% 1x1.4 smd: 1(-0.9,0) 2(0.9,0)
  Top Layer pour cut-out: -0.4,0.8 0.4,0.8 0.4,-0.8 -0.4,-0.8
  silkscreen extent -0.15,-0.65 0.15,0.65, body extent -1.1,-0.72 1.1,0.73, height 1.34
CRYSTAL_4-LCC [mm] "SMD Crystal 4-lead leadless package"
  round 0.508 on Mech15: 0(0,0)
  rrect25% 1.4x1.2 smd: 1(-1.1,-0.75) 2(1.1,-0.75) 3(1.1,0.75) 4(-1.1,0.75)
  silkscreen extent -2.6,-2.2 2.16,1.78, body extent -1.65,-1.3 1.65,1.3, height 0.8
CRYSTAL_v2 [mm] "SMD Crystal 2-lead leadless package"
  rrect25% 1.2x2 smd: 1(-1.3,-0.012) 2(1.32,0.012)
  silkscreen extent -2.17,-1.25 2.2,1.25
Fiducial [mm]
  round 1 smd paste-1 mask+1: 1(0,0)
  round 1 smd far side paste-1 mask+1: 1(0,0)
HDR1X6 [mm] "Connector; Header; 6 Position"
  rect 1.5x1.5 hole 0.9: 1(0,0)
  round 1.5 hole 0.9: 2(2.54,0) 3(5.08,0) 4(7.62,0) 5(10.16,0) 6(12.7,0)
  silkscreen extent -1.27,-1.27 13.97,1.27, body extent -1.27,-1.46 13.97,1.46, height 6.78
HDR_1x2 [mil]
  rrect25% 60x60 hole 38: 1(0,50)
  round 62.99 hole 38: 2(0,-50)
  silkscreen extent -49,-98 49,98, body extent -57,-100 57,100, height 267
LED-0603-GREEN [mm]
  round 0.254 on Mech15: 0(0,0)
  rrect25% 0.8x0.8 smd: A(-0.85,0) K(0.85,0)
  Top Layer pour cut-out: -0.5,0.5 0.5,0.5 0.5,-0.5 -0.5,-0.5
  silkscreen extent -1.55,-0.67 1.68,0.67, body extent -0.8,-0.4 0.8,0.4, height 0.75
LGA16-4X4X1.1_N [mm] "PQFN, 16-Leads, Body 4x4mm, Pitch 0.65mm, IPC Medium Density"
  oval 1.1x0.3 smd: 1(-2.025,0.975) 2(-2.025,0.325) 3(-2.025,-0.325) 4(-2.025,-0.975) 9(2.025,-0.975) 10(2.025,-0.325) 11(2.025,0.325) 12(2.025,0.975)
  oval 0.3x1.1 smd: 5(-0.975,-2.025) 6(-0.325,-2.025) 7(0.325,-2.025) 8(0.975,-2.025) 13(0.975,2.025) 14(0.325,2.025) 15(-0.325,2.025) 16(-0.975,2.025)
  silkscreen extent -3,-2.23 2.23,2.23, body extent -2.07,-2.07 2.07,2.07, height 1.1
LT-S8-8_M [mm] "SOIC, 8-Leads, Body 4.9x3.9mm, Pitch 1.27mm, IPC Low Density"
  oval 2.5x0.7 smd: 1(-2.45,1.905) 2(-2.45,0.635) 3(-2.45,-0.635) 4(-2.45,-1.905) 5(2.45,-1.905) 6(2.45,-0.635) 7(2.45,0.635) 8(2.45,1.905)
  silkscreen extent -2.57,-2.5 0.8,2.93, body extent -2.89,-2.47 2.89,2.43, height 1.45
microUSB [mm]
  rect 0.4x1.35 smd: 1(-1.3,2.675) 2(-0.65,2.675) 3(0,2.675) 4(0.65,2.675) 5(1.3,2.675)
  oval 0.9x1.6 hole 0.5 slot 1.2 at 90 deg: 6(-3.3,0) 6(3.3,0)
  rect 1.6x1.4 smd: 6(-3.2,2.45) 6(3.2,2.45)
  rect 1.9x1.9 smd: 6(-1.2,0) 6(1.2,0)
  silkscreen extent -4.5,-1.5 4.5,3.75, body extent -3.89,-2.56 3.89,2.93, height 2.59
MMCX_UFL_conn_u [mm]
  rect 1.55x1 smd mask+0.05: 1(0,1.7) 2(0,-1.7)
  rect 1.2x1.2 smd mask+0.05: 1(0,1.6) 2(0,-1.6)
  rect 1.2x1.6 smd mask+0.05: 2(-1.7,0) 2(1.7,0)
  rect 1.2x2.15 smd mask+0.05: 2(-1.4,0) 2(1.4,0)
  silkscreen extent -2.3,-2.2 2.3,2.2, body extent -1.5,-1.55 1.5,1.55, height 1.25
MPU-9255 [mm] "QFN, 24-Leads, Body 4,00x4,00mm, Pitch 0,50mm, thermal pad, IPC Medium Density"
  rrect50% 0.7x0.22 smd mask+0.05: 1(-1.575,1) 2(-1.575,0.6) 3(-1.575,0.2) 4(-1.575,-0.2) 5(-1.575,-0.6) 6(-1.575,-1) 13(1.575,-1) 14(1.575,-0.6) 15(1.575,-0.2) 16(1.575,0.2) 17(1.575,0.6) 18(1.575,1)
  rrect50% 0.22x0.7 smd mask+0.05: 7(-1,-1.575) 8(-0.6,-1.575) 9(-0.2,-1.575) 10(0.2,-1.575) 11(0.6,-1.575) 12(1,-1.575) 19(1,1.575) 20(0.6,1.575) 21(0.2,1.575) 22(-0.2,1.575) 23(-0.6,1.575) 24(-1,1.575)
  silkscreen extent -2.28,-1.85 1.85,1.85, body extent -1.55,-1.55 1.55,1.55, height 1
NEO-M8M [mm]
  rect 3x0.8 smd: 1(6.2,-7) 2(6.2,-5.9) 3(6.2,-4.8) 4(6.2,-3.7) 5(6.2,-2.6) 6(6.2,-1.5) 7(6.2,-0.4) 8(6.2,2.6) 9(6.2,3.7) 10(6.2,4.8) 11(6.2,5.9) 12(6.2,7) 13(-6.2,7) 14(-6.2,5.9) 15(-6.2,4.8) 16(-6.2,3.7) 17(-6.2,2.6) 18(-6.2,-0.4) 19(-6.2,-1.5) 20(-6.2,-2.6) 21(-6.2,-3.7) 22(-6.2,-4.8) 23(-6.2,-5.9) 24(-6.2,-7)
  silkscreen extent -8.2,-8.1 8.3,7.9
NetTie_Narrow2 [mm]
  rect 0.4x0.8 on Mid4 mask+0.102: 1(-0.575,0) 2(0.575,0)
  L5 region: -0.775,0.4 -0.775,-0.4 0.775,-0.4 0.775,0.4
RES0402 [mm] "Chip Resistor, Body 1.0x0.5mm, EIA 0402, IPC Medium Density"
  round 0.2 on Mech15: 0(0,0)
  rrect20% 0.6x0.6 smd: 1(-0.5,0) 2(0.5,0)
  Top Layer pour cut-out: -0.2,0.35 0.2,0.35 0.2,-0.35 -0.2,-0.35
  silkscreen extent -1.05,-0.55 1.05,0.55, body extent -0.52,-0.27 0.53,0.28, height 0.4
RES0603 [mm] "Chip Resistor, Body 1.6x0.8mm, 0603, IPC Medium Density"
  round 0.254 on Mech15: 0(0,0)
  rrect25% 0.9x1 smd: 1(-0.85,0) 2(0.85,0)
  Top Layer pour cut-out: -0.4,0.6 0.4,0.6 0.4,-0.6 -0.4,-0.6
  silkscreen extent -0.15,-0.41 0.15,0.41, body extent -0.87,-0.47 0.88,0.48, height 0.54
STM-LQFP100_M [mm] "Thin QFP, 100-Leads, Body 14x14mm, Pitch 0.5mm, IPC Low Density"
  oval 2.1x0.3 smd: 1(-7.6,6) 2(-7.6,5.5) 3(-7.6,5) 4(-7.6,4.5) 5(-7.6,4) 6(-7.6,3.5) 7(-7.6,3) 8(-7.6,2.5) 9(-7.6,2) 10(-7.6,1.5) 11(-7.6,1) 12(-7.6,0.5) 13(-7.6,0) 14(-7.6,-0.5) 15(-7.6,-1) 16(-7.6,-1.5) 17(-7.6,-2) 18(-7.6,-2.5) 19(-7.6,-3) 20(-7.6,-3.5) 21(-7.6,-4) 22(-7.6,-4.5) 23(-7.6,-5) 24(-7.6,-5.5) 25(-7.6,-6) 51(7.6,-6) 52(7.6,-5.5) 53(7.6,-5) 54(7.6,-4.5) 55(7.6,-4) 56(7.6,-3.5) 57(7.6,-3) 58(7.6,-2.5) 59(7.6,-2) 60(7.6,-1.5) 61(7.6,-1) 62(7.6,-0.5) 63(7.6,0) 64(7.6,0.5) 65(7.6,1) 66(7.6,1.5) 67(7.6,2) 68(7.6,2.5) 69(7.6,3) 70(7.6,3.5) 71(7.6,4) 72(7.6,4.5) 73(7.6,5) 74(7.6,5.5) 75(7.6,6)
  oval 0.3x2.1 smd: 26(-6,-7.6) 27(-5.5,-7.6) 28(-5,-7.6) 29(-4.5,-7.6) 30(-4,-7.6) 31(-3.5,-7.6) 32(-3,-7.6) 33(-2.5,-7.6) 34(-2,-7.6) 35(-1.5,-7.6) 36(-1,-7.6) 37(-0.5,-7.6) 38(0,-7.6) 39(0.5,-7.6) 40(1,-7.6) 41(1.5,-7.6) 42(2,-7.6) 43(2.5,-7.6) 44(3,-7.6) 45(3.5,-7.6) 46(4,-7.6) 47(4.5,-7.6) 48(5,-7.6) 49(5.5,-7.6) 50(6,-7.6) 76(6,7.6) 77(5.5,7.6) 78(5,7.6) 79(4.5,7.6) 80(4,7.6) 81(3.5,7.6) 82(3,7.6) 83(2.5,7.6) 84(2,7.6) 85(1.5,7.6) 86(1,7.6) 87(0.5,7.6) 88(0,7.6) 89(-0.5,7.6) 90(-1,7.6) 91(-1.5,7.6) 92(-2,7.6) 93(-2.5,7.6) 94(-3,7.6) 95(-3.5,7.6) 96(-4,7.6) 97(-4.5,7.6) 98(-5,7.6) 99(-5.5,7.6) 100(-6,7.6)
  silkscreen extent -7.72,-6.15 6.15,6.82, body extent -8,-8 8,8, height 1.6
SW_tactile [mm]
  rect 0.8x1.7 smd: 1(1.7,0) 2(-1.7,0)
  silkscreen extent -2.5,-1.2 2.5,1.2, body extent -1.7,-1.1 1.7,1.1, height 2
USBULC6 [mm]
  rect 1x0.3 smd mask+0.05: 1(-0.813,0.5) 2(-0.813,0) 3(-0.813,-0.5) 4(0.812,-0.5) 5(0.812,0) 6(0.812,0.5)
  silkscreen extent -1.62,-0.9 1,0.9, body extent -0.82,-0.5 0.82,0.5, height 1.5

## Part data
BATT1: library part BATT, "42.5 x 25.7 x 6.5 mm 3.7 V 600 mAh Rechargeable Lithium Ion Polymer Battery Pack", Case/Package=600, Manufacturer=Renata, Manufacturer Part Number=ICP622540PMT, Max Charge Current=300mA, Max Operating Temperature=60°C, Min Operating Temperature=-20°C, Output Current=600mA, Output Voltage=3.7V, Supplier Part Number=614-ICP622540PMT, Approvals=IEC, Category="Batteries and Accessories", Chemistry/Technology=Lithium, ComponentLink1Description=https://datasheet.octopart.com:443/ICP622540PMT-Renata-datasheet-181185937.pdf?src-supplier=IHS, ComponentLink1URL=https://datasheet.octopart.com:443/ICP622540PMT-Renata-datasheet-181185937.pdf?src-supplier=IHS, ComponentLink2Description=https://datasheet.octopart.com:443/ICP622540PMT-Renata-datasheet-145014577.pdf?src-supplier=Future+Electronics, ComponentLink2URL=https://datasheet.octopart.com:443/ICP622540PMT-Renata-datasheet-145014577.pdf?src-supplier=Future+Electronics, ComponentLink3Description=https://datasheet.octopart.com:443/ICP622540PMT-Renata-datasheet-62059859.pdf?src-supplier=Future+Electronics, ComponentLink3URL=https://datasheet.octopart.com:443/ICP622540PMT-Renata-datasheet-62059859.pdf?src-supplier=Future+Electronics, Country of Origin=Switzerland, Export Control Classification Number (ECCN) Code=3A991.J.2, Harmonized Tariff Schedule (HTS) Code=8507.80.82.00, Height=6.5mm, Introduction Date=2018-12-20, Lead Free="Lead Free", Length=42.5mm, Lifecycle Status=Production, Number of Batteries=1, Pricing="1=14.08, 10=11.74, 50=10.3, 100=9.75, 1000=9.72, 10000=9.72 (USD)", REACH SVHC=No, Stock=493, Supplier=Mouser, Termination=Wire, Voltage=3.7V, Weight=11g, Width=25.7mm
C1 C7 C11 C15 C17 C18 C20 C23 C25 C26 C27 C28 C29 C30 C31 C32 C34 C39 C42 C43 C44 C45 C49: library part Cap, "16V 100nF X7R ±10% 0402 Multilayer Ceramic Capacitors MLCC - SMD/SMT ROHS", Case Code (Imperial)=0402, Case Code (Metric)=1005, Dielectric=X7R, Dielectric Material=Ceramic, Manufacturer=Murata, Manufacturer Lifecycle Status="IN PRODUCTION", Manufacturer Part Number=GCM155R71C104KA55D, Max Operating Temperature=125°C, Min Operating Temperature=-55°C, Ratings=AEC-Q200, Tolerance=10%, Voltage=16V, Case/Package=0402, Category="Ceramic Capacitors", ComponentLink1Description=https://datasheet.octopart.com:443/GCM155R71C104KA55D-Murata-datasheet-149522428.pdf?src-supplier=Newark, ComponentLink1URL=https://datasheet.octopart.com:443/GCM155R71C104KA55D-Murata-datasheet-149522428.pdf?src-supplier=Newark, ComponentLink2Description=https://datasheet.octopart.com:443/GCM155R71C104KA55D-Murata-datasheet-11777063.pdf?src-supplier=_legacy+Avnet, ComponentLink2URL=https://datasheet.octopart.com:443/GCM155R71C104KA55D-Murata-datasheet-11777063.pdf?src-supplier=_legacy+Avnet, ComponentLink3Description=https://datasheet.octopart.com:443/GCM155R71C104KA55D-Murata-datasheet-14404342.pdf?src-supplier=Future+Electronics, ComponentLink3URL=https://datasheet.octopart.com:443/GCM155R71C104KA55D-Murata-datasheet-14404342.pdf?src-supplier=Future+Electronics, ComponentLink4Description=https://datasheet.octopart.com:443/GCM155R71C104KA55D-Murata-datasheet-44104237.pdf?src-supplier=Future+Electronics, ComponentLink4URL=https://datasheet.octopart.com:443/GCM155R71C104KA55D-Murata-datasheet-44104237.pdf?src-supplier=Future+Electronics, ComponentLink5Description=https://datasheet.octopart.com:443/GCM155R71C104KA55D-Murata-datasheet-165579661.pdf?src-supplier=TME, ComponentLink5URL=https://datasheet.octopart.com:443/GCM155R71C104KA55D-Murata-datasheet-165579661.pdf?src-supplier=TME, ComponentLink6Description=https://datasheet.octopart.com:443/GCM155R71C104KA55D-Murata-datasheet-62117434.pdf?src-supplier=TME, ComponentLink6URL=https://datasheet.octopart.com:443/GCM155R71C104KA55D-Murata-datasheet-62117434.pdf?src-supplier=TME, ComponentLink7Description=https://datasheet.octopart.com:443/GCM155R71C104KA55D-Murata-datasheet-141266224.pdf?src-supplier=Ciiva, ComponentLink7URL=https://datasheet.octopart.com:443/GCM155R71C104KA55D-Murata-datasheet-141266224.pdf?src-supplier=Ciiva, ComponentLink8Description=https://datasheet.octopart.com:443/GCM155R71C104KA55D-Murata-datasheet-140656701.pdf?src-supplier=Ciiva, ComponentLink8URL=https://datasheet.octopart.com:443/GCM155R71C104KA55D-Murata-datasheet-140656701.pdf?src-supplier=Ciiva, ComponentLink9Description=https://datasheet.octopart.com:443/GCM155R71C104KA55D-Murata-datasheet-138716406.pdf?src-supplier=Ciiva, ComponentLink9URL=https://datasheet.octopart.com:443/GCM155R71C104KA55D-Murata-datasheet-138716406.pdf?src-supplier=Ciiva, ComponentLink10Description=https://datasheet.octopart.com:443/GCM155R71C104KA55D-Murata-datasheet-12515163.pdf?src-supplier=Farnell, ComponentLink10URL=https://datasheet.octopart.com:443/GCM155R71C104KA55D-Murata-datasheet-12515163.pdf?src-supplier=Farnell, ComponentLink11Description=http://sigma.octopart.com:80/reach_statement/Murata-company-16.pdf?src-supplier=Compliance+Statements, ComponentLink11URL=http://sigma.octopart.com:80/reach_statement/Murata-company-16.pdf?src-supplier=Compliance+Statements, Country of Origin=Philippines, Depth=500µm, Export Control Classification Number (ECCN) Code=EAR99, Harmonized Tariff Schedule (HTS) Code=8532.24.00.20, Height=500µm, Introduction Date=2007-06-21, Lead Free="Lead Free", Length=1mm, Lifecycle Status=Production, Material=Ceramic, Mounting Technology="Surface Mount", Number of Terminals=2, Packaging="Cut Tape", Pricing="10000=0.0057 (EUR)", Radiation Hardening=No, REACH SVHC=Yes, RoHS=Compliant, Schedule B="8532240020, 8532240020|8532240020, 8532240020|8532240020|8532240020, 8532240020|8532240020|8532240020|8532240020", Stock=760000, Supplier=Farnell, Supplier Part Number=GCM155R71C104KA55D, Termination=SMD/SMT, Voltage Rating=16V, Voltage Rating (DC)=16V, Width=500µm
C2 C6 C8 C10 C12 C14 C16 C24 C33 C46: library part Cap, "6.3V 10uF X5R 卤20% 0402 Multilayer Ceramic Capacitors MLCC - SMD/SMT ROHS", Case Code (Imperial)=0402, Case Code (Metric)=1005, Dielectric=X5R, Dielectric Material=Ceramic, Manufacturer="Samsung Electro-Mechanics", Manufacturer Part Number=CL05A106MQ5NUNC, Max Operating Temperature=85°C, Min Operating Temperature=-55°C, Tolerance=20%, Voltage Rating=6.3V, Case/Package=0402, Category="Ceramic Capacitors", China RoHS=Compliant, ComponentLink1Description=https://datasheet.octopart.com:443/CL05A106MQ5NUNC-Samsung-Electro-Mechanics-datasheet-136031724.pdf?src-supplier=Newark, ComponentLink1URL=https://datasheet.octopart.com:443/CL05A106MQ5NUNC-Samsung-Electro-Mechanics-datasheet-136031724.pdf?src-supplier=Newark, ComponentLink2Description=https://datasheet.octopart.com:443/CL05A106MQ5NUNC-Samsung-Electro-Mechanics-datasheet-181551184.pdf?src-supplier=Newark, ComponentLink2URL=https://datasheet.octopart.com:443/CL05A106MQ5NUNC-Samsung-Electro-Mechanics-datasheet-181551184.pdf?src-supplier=Newark, ComponentLink3Description=https://datasheet.octopart.com:443/CL05A106MQ5NUNC-Samsung-Electro-Mechanics-datasheet-110226207.pdf?src-supplier=Future+Electronics, ComponentLink3URL=https://datasheet.octopart.com:443/CL05A106MQ5NUNC-Samsung-Electro-Mechanics-datasheet-110226207.pdf?src-supplier=Future+Electronics, ComponentLink4Description=https://datasheet.octopart.com:443/CL05A106MQ5NUNC-Samsung-Electro-Mechanics-datasheet-81461596.pdf?src-supplier=Future+Electronics, ComponentLink4URL=https://datasheet.octopart.com:443/CL05A106MQ5NUNC-Samsung-Electro-Mechanics-datasheet-81461596.pdf?src-supplier=Future+Electronics, ComponentLink5Description=https://datasheet.octopart.com:443/CL05A106MQ5NUNC-Samsung-datasheet-42280528.pdf?src-supplier=Future+Electronics, ComponentLink5URL=https://datasheet.octopart.com:443/CL05A106MQ5NUNC-Samsung-datasheet-42280528.pdf?src-supplier=Future+Electronics, ComponentLink6Description=https://datasheet.octopart.com:443/CL05A106MQ5NUNC-Samsung-datasheet-34153003.pdf?src-supplier=Future+Electronics, ComponentLink6URL=https://datasheet.octopart.com:443/CL05A106MQ5NUNC-Samsung-datasheet-34153003.pdf?src-supplier=Future+Electronics, ComponentLink7Description=https://datasheet.octopart.com:443/CL05A106MQ5NUNC-Samsung-datasheet-26589001.pdf?src-supplier=Future+Electronics, ComponentLink7URL=https://datasheet.octopart.com:443/CL05A106MQ5NUNC-Samsung-datasheet-26589001.pdf?src-supplier=Future+Electronics, ComponentLink8Description=https://datasheet.octopart.com:443/CL05A106MQ5NUNC-Samsung-datasheet-12538126.pdf?src-supplier=Future+Electronics, ComponentLink8URL=https://datasheet.octopart.com:443/CL05A106MQ5NUNC-Samsung-datasheet-12538126.pdf?src-supplier=Future+Electronics, ComponentLink9Description=https://datasheet.octopart.com:443/CL05A106MQ5NUNC-Samsung-Electro-Mechanics-datasheet-149136671.pdf?src-supplier=Future+Electronics, ComponentLink9URL=https://datasheet.octopart.com:443/CL05A106MQ5NUNC-Samsung-Electro-Mechanics-datasheet-149136671.pdf?src-supplier=Future+Electronics, ComponentLink10Description=https://datasheet.octopart.com:443/CL05A106MQ5NUNC-Samsung-datasheet-59220082.pdf?src-supplier=TME, ComponentLink10URL=https://datasheet.octopart.com:443/CL05A106MQ5NUNC-Samsung-datasheet-59220082.pdf?src-supplier=TME, Depth=500µm, Height=700µm, Length=1mm, Lifecycle Status=Production, Mounting Technology="Surface Mount", Number of Terminals=2, Pricing="10000=0.0171, 20000=0.0168, 30000=0.0166, 50000=0.0158, 70000=0.0157, 100000=0.0154 (USD)", Radiation Hardening=No, REACH SVHC=Yes, RoHS=Compliant, Schedule B="8532240020, 8532240020|8532240020, 8532240020|8532240020|8532240020, 8532240020|8532240020|8532240020|8532240020", Stock=15790000, Supplier="Arrow Electronics", Supplier Part Number=CL05A106MQ5NUNC, Thickness=711.2µm, Voltage Rating (DC)=6.3V, Width=500µm
C3 C19 C47: library part Cap, "6.3V 4.7uF X5R 卤20% 0402 Multilayer Ceramic Capacitors MLCC - SMD/SMT ROHS", Case Code (Imperial)=0402, Case Code (Metric)=1005, Dielectric=X5R, Dielectric Material=Ceramic, Manufacturer="Samsung Electro-Mechanics", Manufacturer Part Number=CL05A475MQ5NRNC, Max Operating Temperature=85°C, Min Operating Temperature=-55°C, Tolerance=20%, Voltage Rating=6.3V, Case/Package=0402, Category="Ceramic Capacitors", China RoHS=Compliant, ComponentLink1Description=https://datasheet.octopart.com:443/CL05A475MQ5NRNC-Samsung-Electro-Mechanics-datasheet-136031739.pdf?src-supplier=IHS, ComponentLink1URL=https://datasheet.octopart.com:443/CL05A475MQ5NRNC-Samsung-Electro-Mechanics-datasheet-136031739.pdf?src-supplier=IHS, ComponentLink2Description=https://datasheet.octopart.com:443/CL05A475MQ5NRNC-Samsung-Electro-Mechanics-datasheet-159675397.pdf?src-supplier=ICpick, ComponentLink2URL=https://datasheet.octopart.com:443/CL05A475MQ5NRNC-Samsung-Electro-Mechanics-datasheet-159675397.pdf?src-supplier=ICpick, ComponentLink3Description=https://datasheet.octopart.com:443/CL05A475MQ5NRNC-Samsung-Electro-Mechanics-datasheet-130009127.pdf?src-supplier=Future+Electronics, ComponentLink3URL=https://datasheet.octopart.com:443/CL05A475MQ5NRNC-Samsung-Electro-Mechanics-datasheet-130009127.pdf?src-supplier=Future+Electronics, ComponentLink4Description=https://datasheet.octopart.com:443/CL05A475MQ5NRNC-Samsung-Electro-Mechanics-datasheet-81461613.pdf?src-supplier=Future+Electronics, ComponentLink4URL=https://datasheet.octopart.com:443/CL05A475MQ5NRNC-Samsung-Electro-Mechanics-datasheet-81461613.pdf?src-supplier=Future+Electronics, ComponentLink5Description=https://datasheet.octopart.com:443/CL05A475MQ5NRNC-Samsung-datasheet-34153550.pdf?src-supplier=Future+Electronics, ComponentLink5URL=https://datasheet.octopart.com:443/CL05A475MQ5NRNC-Samsung-datasheet-34153550.pdf?src-supplier=Future+Electronics, ComponentLink6Description=https://datasheet.octopart.com:443/CL05A475MQ5NRNC-Samsung-Electro-Mechanics-datasheet-81842477.pdf?src-supplier=Future+Electronics, ComponentLink6URL=https://datasheet.octopart.com:443/CL05A475MQ5NRNC-Samsung-Electro-Mechanics-datasheet-81842477.pdf?src-supplier=Future+Electronics, ComponentLink7Description=https://datasheet.octopart.com:443/CL05A475MQ5NRNC-Samsung-datasheet-12537359.pdf?src-supplier=Future+Electronics, ComponentLink7URL=https://datasheet.octopart.com:443/CL05A475MQ5NRNC-Samsung-datasheet-12537359.pdf?src-supplier=Future+Electronics, ComponentLink8Description=https://datasheet.octopart.com:443/CL05A475MQ5NRNC-Samsung-datasheet-26589016.pdf?src-supplier=Future+Electronics, ComponentLink8URL=https://datasheet.octopart.com:443/CL05A475MQ5NRNC-Samsung-datasheet-26589016.pdf?src-supplier=Future+Electronics, ComponentLink9Description=https://datasheet.octopart.com:443/CL05A475MQ5NRNC-Samsung-datasheet-8324245.pdf?src-supplier=Future+Electronics, ComponentLink9URL=https://datasheet.octopart.com:443/CL05A475MQ5NRNC-Samsung-datasheet-8324245.pdf?src-supplier=Future+Electronics, ComponentLink10Description=https://datasheet.octopart.com:443/CL05A475MQ5NRNC-Samsung-Electro-Mechanics-datasheet-149136697.pdf?src-supplier=Future+Electronics, ComponentLink10URL=https://datasheet.octopart.com:443/CL05A475MQ5NRNC-Samsung-Electro-Mechanics-datasheet-149136697.pdf?src-supplier=Future+Electronics, ComponentLink11Description=https://datasheet.octopart.com:443/CL05A475MQ5NRNC-Samsung-Electro-Mechanics-datasheet-11778223.pdf?src-supplier=Arrow+Electronics, ComponentLink11URL=https://datasheet.octopart.com:443/CL05A475MQ5NRNC-Samsung-Electro-Mechanics-datasheet-11778223.pdf?src-supplier=Arrow+Electronics, ComponentLink12Description=https://datasheet.octopart.com:443/CL05A475MQ5NRNC-Samsung-datasheet-8326407.pdf?src-supplier=TME, ComponentLink12URL=https://datasheet.octopart.com:443/CL05A475MQ5NRNC-Samsung-datasheet-8326407.pdf?src-supplier=TME, Depth=500µm, Height=650µm, Length=1mm, Lifecycle Status=Production, Mounting Technology="Surface Mount", Number of Terminals=2, Pricing="10=0.0525, 100=0.0306, 500=0.0229, 2500=0.0172, 5000=0.0153 (EUR)", Radiation Hardening=No, REACH SVHC=Yes, RoHS=Compliant, Schedule B="8532240020, 8532240020|8532240020, 8532240020|8532240020|8532240020, 8532240020|8532240020|8532240020|8532240020", Stock=29033, Supplier=Farnell, Supplier Part Number=CL05A475MQ5NRNC, Thickness=558.8µm, Voltage Rating (DC)=6.3V, Width=500µm
C4: library part Cap, "Cap, 0.0039Uf, 16V, Mlcc, 0402 Rohs Compliant: Yes", Case/Package=0402, Dielectric Material=Ceramic, Manufacturer="Yageo Group", Manufacturer Part Number=C0402C392J4JACAUTO, Max Operating Temperature=125°C, Min Operating Temperature=-55°C, Ratings=AEC-Q200, Voltage Rating (DC)=15V, Category="Ceramic Capacitors", China RoHS=Compliant, ComponentLink1Description=https://datasheet.octopart.com:443/C0402C392J4JACAUTO-KEMET-datasheet-175574894.pdf?src-supplier=IHS, ComponentLink1URL=https://datasheet.octopart.com:443/C0402C392J4JACAUTO-KEMET-datasheet-175574894.pdf?src-supplier=IHS, ComponentLink2Description=https://datasheet.octopart.com:443/C0402C392J4JACAUTO-KEMET-datasheet-141421995.pdf?src-supplier=Farnell, ComponentLink2URL=https://datasheet.octopart.com:443/C0402C392J4JACAUTO-KEMET-datasheet-141421995.pdf?src-supplier=Farnell, ComponentLink3Description=https://datasheet.octopart.com:443/C0402C392J4JACAUTO-KEMET-datasheet-176334293.pdf?src-supplier=Newark, ComponentLink3URL=https://datasheet.octopart.com:443/C0402C392J4JACAUTO-KEMET-datasheet-176334293.pdf?src-supplier=Newark, ComponentLink4Description=https://datasheet.octopart.com:443/C0402C392J4JACAUTO-KEMET-datasheet-163667000.pdf?src-supplier=Newark, ComponentLink4URL=https://datasheet.octopart.com:443/C0402C392J4JACAUTO-KEMET-datasheet-163667000.pdf?src-supplier=Newark, Country of Origin=Mexico, Export Control Classification Number (ECCN) Code=EAR99, Harmonized Tariff Schedule (HTS) Code=8532.24.00.20, Height=500µm, Introduction Date=2022-03-02, Length=1mm, Lifecycle Status=Production, Mounting Technology="Surface Mount", Number of Terminals=2, Pricing="10=0.296, 100=0.185, 500=0.149, 1000=0.126, 2000=0.121, 4000=0.116 (EUR)", REACH SVHC=Yes, RoHS=Compliant, Stock=9420, Supplier=Farnell, Supplier Part Number=C0402C392J4JACAUTO, Width=500µm
C5 C9 C13: library part Cap, "Multilayer Ceramic Capacitors MLCC - SMD/SMT 47uF 6.3V X5R +/-20% 0805 Gen Purp", Case Code (Imperial)=0805, Case Code (Metric)=2012, Dielectric=X5R, Dielectric Material=Ceramic, Manufacturer="TAIYO YUDEN", Manufacturer Package Identifier="0805 (2012 metric)", Manufacturer Part Number=JMK212BJ476MG-T, Max Operating Temperature=85°C, Min Operating Temperature=-55°C, Supplier Part Number=963-JMK212BJ476MG-T, Tolerance=20%, Voltage Rating=6.3V, Case/Package=0805, Category="Ceramic Capacitors", ComponentLink1Description=https://datasheet.octopart.com:443/JMK212BJ476MG-T-Taiyo-Yuden-datasheet-154807738.pdf?src-supplier=Newark, ComponentLink1URL=https://datasheet.octopart.com:443/JMK212BJ476MG-T-Taiyo-Yuden-datasheet-154807738.pdf?src-supplier=Newark, ComponentLink2Description=https://datasheet.octopart.com:443/JMK212BJ476MG-T-Taiyo-Yuden-datasheet-10851928.pdf?src-supplier=Newark, ComponentLink2URL=https://datasheet.octopart.com:443/JMK212BJ476MG-T-Taiyo-Yuden-datasheet-10851928.pdf?src-supplier=Newark, ComponentLink3Description=https://datasheet.octopart.com:443/CEJMK212BJ476MG-T-Taiyo-Yuden-datasheet-159617017.pdf?src-supplier=IHS, ComponentLink3URL=https://datasheet.octopart.com:443/CEJMK212BJ476MG-T-Taiyo-Yuden-datasheet-159617017.pdf?src-supplier=IHS, ComponentLink4Description=https://datasheet.octopart.com:443/JMK212BJ476MG-T-Taiyo-Yuden-datasheet-140424376.pdf?src-supplier=Master+Electronics, ComponentLink4URL=https://datasheet.octopart.com:443/JMK212BJ476MG-T-Taiyo-Yuden-datasheet-140424376.pdf?src-supplier=Master+Electronics, ComponentLink5Description=https://datasheet.octopart.com:443/JMK212BJ476MG-T-Taiyo-Yuden-datasheet-138516745.pdf?src-supplier=Master+Electronics, ComponentLink5URL=https://datasheet.octopart.com:443/JMK212BJ476MG-T-Taiyo-Yuden-datasheet-138516745.pdf?src-supplier=Master+Electronics, ComponentLink6Description=https://datasheet.octopart.com:443/CEJMK212BJ476MG-T-Taiyo-Yuden-datasheet-154807850.pdf?src-supplier=Master+Electronics, ComponentLink6URL=https://datasheet.octopart.com:443/CEJMK212BJ476MG-T-Taiyo-Yuden-datasheet-154807850.pdf?src-supplier=Master+Electronics, ComponentLink7Description=https://datasheet.octopart.com:443/JMK212BJ476MG-T-Taiyo-Yuden-datasheet-99833423.pdf?src-supplier=Future+Electronics, ComponentLink7URL=https://datasheet.octopart.com:443/JMK212BJ476MG-T-Taiyo-Yuden-datasheet-99833423.pdf?src-supplier=Future+Electronics, ComponentLink8Description=https://datasheet.octopart.com:443/JMK212BJ476MG-T-Taiyo-Yuden-datasheet-99833418.pdf?src-supplier=Future+Electronics, ComponentLink8URL=https://datasheet.octopart.com:443/JMK212BJ476MG-T-Taiyo-Yuden-datasheet-99833418.pdf?src-supplier=Future+Electronics, ComponentLink9Description=https://datasheet.octopart.com:443/CEJMK212BJ476MG-T-Taiyo-Yuden-datasheet-62339906.pdf?src-supplier=Electro+Sonic, ComponentLink9URL=https://datasheet.octopart.com:443/CEJMK212BJ476MG-T-Taiyo-Yuden-datasheet-62339906.pdf?src-supplier=Electro+Sonic, ComponentLink10Description=https://datasheet.octopart.com:443/JMK212BJ476MG-T-Taiyo-Yuden-datasheet-62109412.pdf?src-supplier=Electro+Sonic, ComponentLink10URL=https://datasheet.octopart.com:443/JMK212BJ476MG-T-Taiyo-Yuden-datasheet-62109412.pdf?src-supplier=Electro+Sonic, ComponentLink11Description=https://datasheet.octopart.com:443/JMK212BJ476MG-T-Taiyo-Yuden-datasheet-41579547.pdf?src-supplier=Electro+Sonic, ComponentLink11URL=https://datasheet.octopart.com:443/JMK212BJ476MG-T-Taiyo-Yuden-datasheet-41579547.pdf?src-supplier=Electro+Sonic, ComponentLink12Description=https://datasheet.octopart.com:443/JMK212BJ476MG-T-Taiyo-Yuden-datasheet-27089081.pdf?src-supplier=Electro+Sonic, ComponentLink12URL=https://datasheet.octopart.com:443/JMK212BJ476MG-T-Taiyo-Yuden-datasheet-27089081.pdf?src-supplier=Electro+Sonic, ComponentLink13Description=https://datasheet.octopart.com:443/JMK212BJ476MG-T-Taiyo-Yuden-datasheet-13694273.pdf?src-supplier=_legacy+Avnet, ComponentLink13URL=https://datasheet.octopart.com:443/JMK212BJ476MG-T-Taiyo-Yuden-datasheet-13694273.pdf?src-supplier=_legacy+Avnet, ComponentLink14Description=https://datasheet.octopart.com:443/JMK212BJ476MG-T-Taiyo-Yuden-datasheet-10742123.pdf?src-supplier=Factory+Futures, ComponentLink14URL=https://datasheet.octopart.com:443/JMK212BJ476MG-T-Taiyo-Yuden-datasheet-10742123.pdf?src-supplier=Factory+Futures, ComponentLink15Description=https://datasheet.octopart.com:443/JMK212BJ476MG-T-Taiyo-Yuden-datasheet-8857305.pdf?src-supplier=element14, ComponentLink15URL=https://datasheet.octopart.com:443/JMK212BJ476MG-T-Taiyo-Yuden-datasheet-8857305.pdf?src-supplier=element14, ComponentLink16Description=https://datasheet.octopart.com:443/JMK212BJ476MG-T-Taiyo-Yuden-datasheet-8434558.pdf?src-supplier=element14, ComponentLink16URL=https://datasheet.octopart.com:443/JMK212BJ476MG-T-Taiyo-Yuden-datasheet-8434558.pdf?src-supplier=element14, ComponentLink17Description=https://datasheet.octopart.com:443/JMK212BJ476MG-T-Taiyo-Yuden-datasheet-118905.pdf?src-supplier=DigiKey, ComponentLink17URL=https://datasheet.octopart.com:443/JMK212BJ476MG-T-Taiyo-Yuden-datasheet-118905.pdf?src-supplier=DigiKey, Contact Plating=Nickel, Country of Origin="Japan, Mainland China, Malaysia, South Korea", Depth=1.25mm, Export Control Classification Number (ECCN) Code=EAR99, Harmonized Tariff Schedule (HTS) Code=8532.24.00.20, Height=1.25mm, Introduction Date=2007-05-22, Lead Free="Lead Free", Length=2mm, Lifecycle Status=Obsolete, LTB Date=2026-03-31, LTD Date=2026-03-31, Mounting Technology="Surface Mount", Number of Terminals=2, Packaging="Cut Tape", Pins=2, Pricing="1=0.46, 10=0.206, 50=0.206, 100=0.184, 1000=0.136, 10000=0.109 (USD)", Radiation Hardening=No, REACH SVHC=Yes, RoHS=Compliant, Stock=86470, Supplier=Mouser, Termination=SMD/SMT, Thickness=1.3462mm, Voltage Rating (DC)=6.3V, Width=1.25mm
C21: library part Cap, "50V 10nF X7R ±10% 0402 Multilayer Ceramic Capacitors MLCC - SMD/SMT ROHS", Case Code (Imperial)=0402, Case Code (Metric)=1005, Dielectric=X7R, Dielectric Material=Ceramic, Manufacturer=Murata, Manufacturer Lifecycle Status="IN PRODUCTION", Manufacturer Part Number=GCM155R71H103KA55D, Max Operating Temperature=125°C, Min Operating Temperature=-55°C, Ratings=AEC-Q200, Tolerance=10%, Voltage=50V, Case/Package=0402, Category="Ceramic Capacitors", ComponentLink1Description=https://datasheet.octopart.com:443/GCM155R71H103KA55D-Murata-datasheet-149522462.pdf?src-supplier=Farnell, ComponentLink1URL=https://datasheet.octopart.com:443/GCM155R71H103KA55D-Murata-datasheet-149522462.pdf?src-supplier=Farnell, ComponentLink2Description=https://datasheet.octopart.com:443/GCM155R71H103KA55D-Murata-datasheet-39128434.pdf?src-supplier=Newark, ComponentLink2URL=https://datasheet.octopart.com:443/GCM155R71H103KA55D-Murata-datasheet-39128434.pdf?src-supplier=Newark, ComponentLink3Description=https://datasheet.octopart.com:443/GCM155R71H103KA55D-Murata-datasheet-62316942.pdf?src-supplier=element14+APAC, ComponentLink3URL=https://datasheet.octopart.com:443/GCM155R71H103KA55D-Murata-datasheet-62316942.pdf?src-supplier=element14+APAC, ComponentLink4Description=https://datasheet.octopart.com:443/GCM155R71H103KA55D-Murata-datasheet-12541648.pdf?src-supplier=_legacy+Avnet, ComponentLink4URL=https://datasheet.octopart.com:443/GCM155R71H103KA55D-Murata-datasheet-12541648.pdf?src-supplier=_legacy+Avnet, ComponentLink5Description=https://datasheet.octopart.com:443/GCM155R71H103KA55D-Murata-datasheet-14404350.pdf?src-supplier=Future+Electronics, ComponentLink5URL=https://datasheet.octopart.com:443/GCM155R71H103KA55D-Murata-datasheet-14404350.pdf?src-supplier=Future+Electronics, ComponentLink6Description=https://datasheet.octopart.com:443/GCM155R71H103KA55D-Murata-datasheet-44104302.pdf?src-supplier=Future+Electronics, ComponentLink6URL=https://datasheet.octopart.com:443/GCM155R71H103KA55D-Murata-datasheet-44104302.pdf?src-supplier=Future+Electronics, ComponentLink7Description=https://datasheet.octopart.com:443/GCM155R71H103KA55D-Murata-datasheet-141266224.pdf?src-supplier=Ciiva, ComponentLink7URL=https://datasheet.octopart.com:443/GCM155R71H103KA55D-Murata-datasheet-141266224.pdf?src-supplier=Ciiva, ComponentLink8Description=https://datasheet.octopart.com:443/GCM155R71H103KA55D-Murata-datasheet-140656749.pdf?src-supplier=Ciiva, ComponentLink8URL=https://datasheet.octopart.com:443/GCM155R71H103KA55D-Murata-datasheet-140656749.pdf?src-supplier=Ciiva, ComponentLink9Description=https://datasheet.octopart.com:443/GCM155R71H103KA55D-Murata-datasheet-138716454.pdf?src-supplier=Ciiva, ComponentLink9URL=https://datasheet.octopart.com:443/GCM155R71H103KA55D-Murata-datasheet-138716454.pdf?src-supplier=Ciiva, ComponentLink10Description=https://datasheet.octopart.com:443/GCM155R71H103KA55D-Murata-datasheet-12511495.pdf?src-supplier=TME, ComponentLink10URL=https://datasheet.octopart.com:443/GCM155R71H103KA55D-Murata-datasheet-12511495.pdf?src-supplier=TME, ComponentLink11Description=http://sigma.octopart.com:80/reach_statement/Murata-company-16.pdf?src-supplier=Compliance+Statements, ComponentLink11URL=http://sigma.octopart.com:80/reach_statement/Murata-company-16.pdf?src-supplier=Compliance+Statements, Country of Origin=Philippines, Depth=500µm, Export Control Classification Number (ECCN) Code=EAR99, Harmonized Tariff Schedule (HTS) Code=8532.24.00.20, Height=500µm, Introduction Date=2007-06-21, Lead Free="Lead Free", Length=1mm, Lifecycle Status=Production, Material=Ceramic, Mounting Technology="Surface Mount", Number of Terminals=2, Packaging="Cut Tape", Pricing="10=0.0162, 100=0.0134, 500=0.0096, 2500=0.0076, 5000=0.0067 (EUR)", Radiation Hardening=No, REACH SVHC=Yes, RoHS=Compliant, Schedule B="8532240020, 8532240020|8532240020, 8532240020|8532240020|8532240020, 8532240020|8532240020|8532240020|8532240020", Stock=3754485, Supplier=Farnell, Supplier Part Number=GCM155R71H103KA55D, Termination=SMD/SMT, Voltage Rating=50V, Voltage Rating (DC)=50V, Width=500µm